# Altium PCB SYNCBOX.PcbDoc (part 1 of 6)
Units mil, origin at the board's own origin, x right, y up, seen from the top; angles counter-clockwise.
Board outline 8392.2 x 6163.59 mil, 6 copper layers (L1, L2, L3, L4 (PWR), L5, L6), stack 60.709 mil thick; 316 components, 422 nets, 1421 pads, 499 vias.
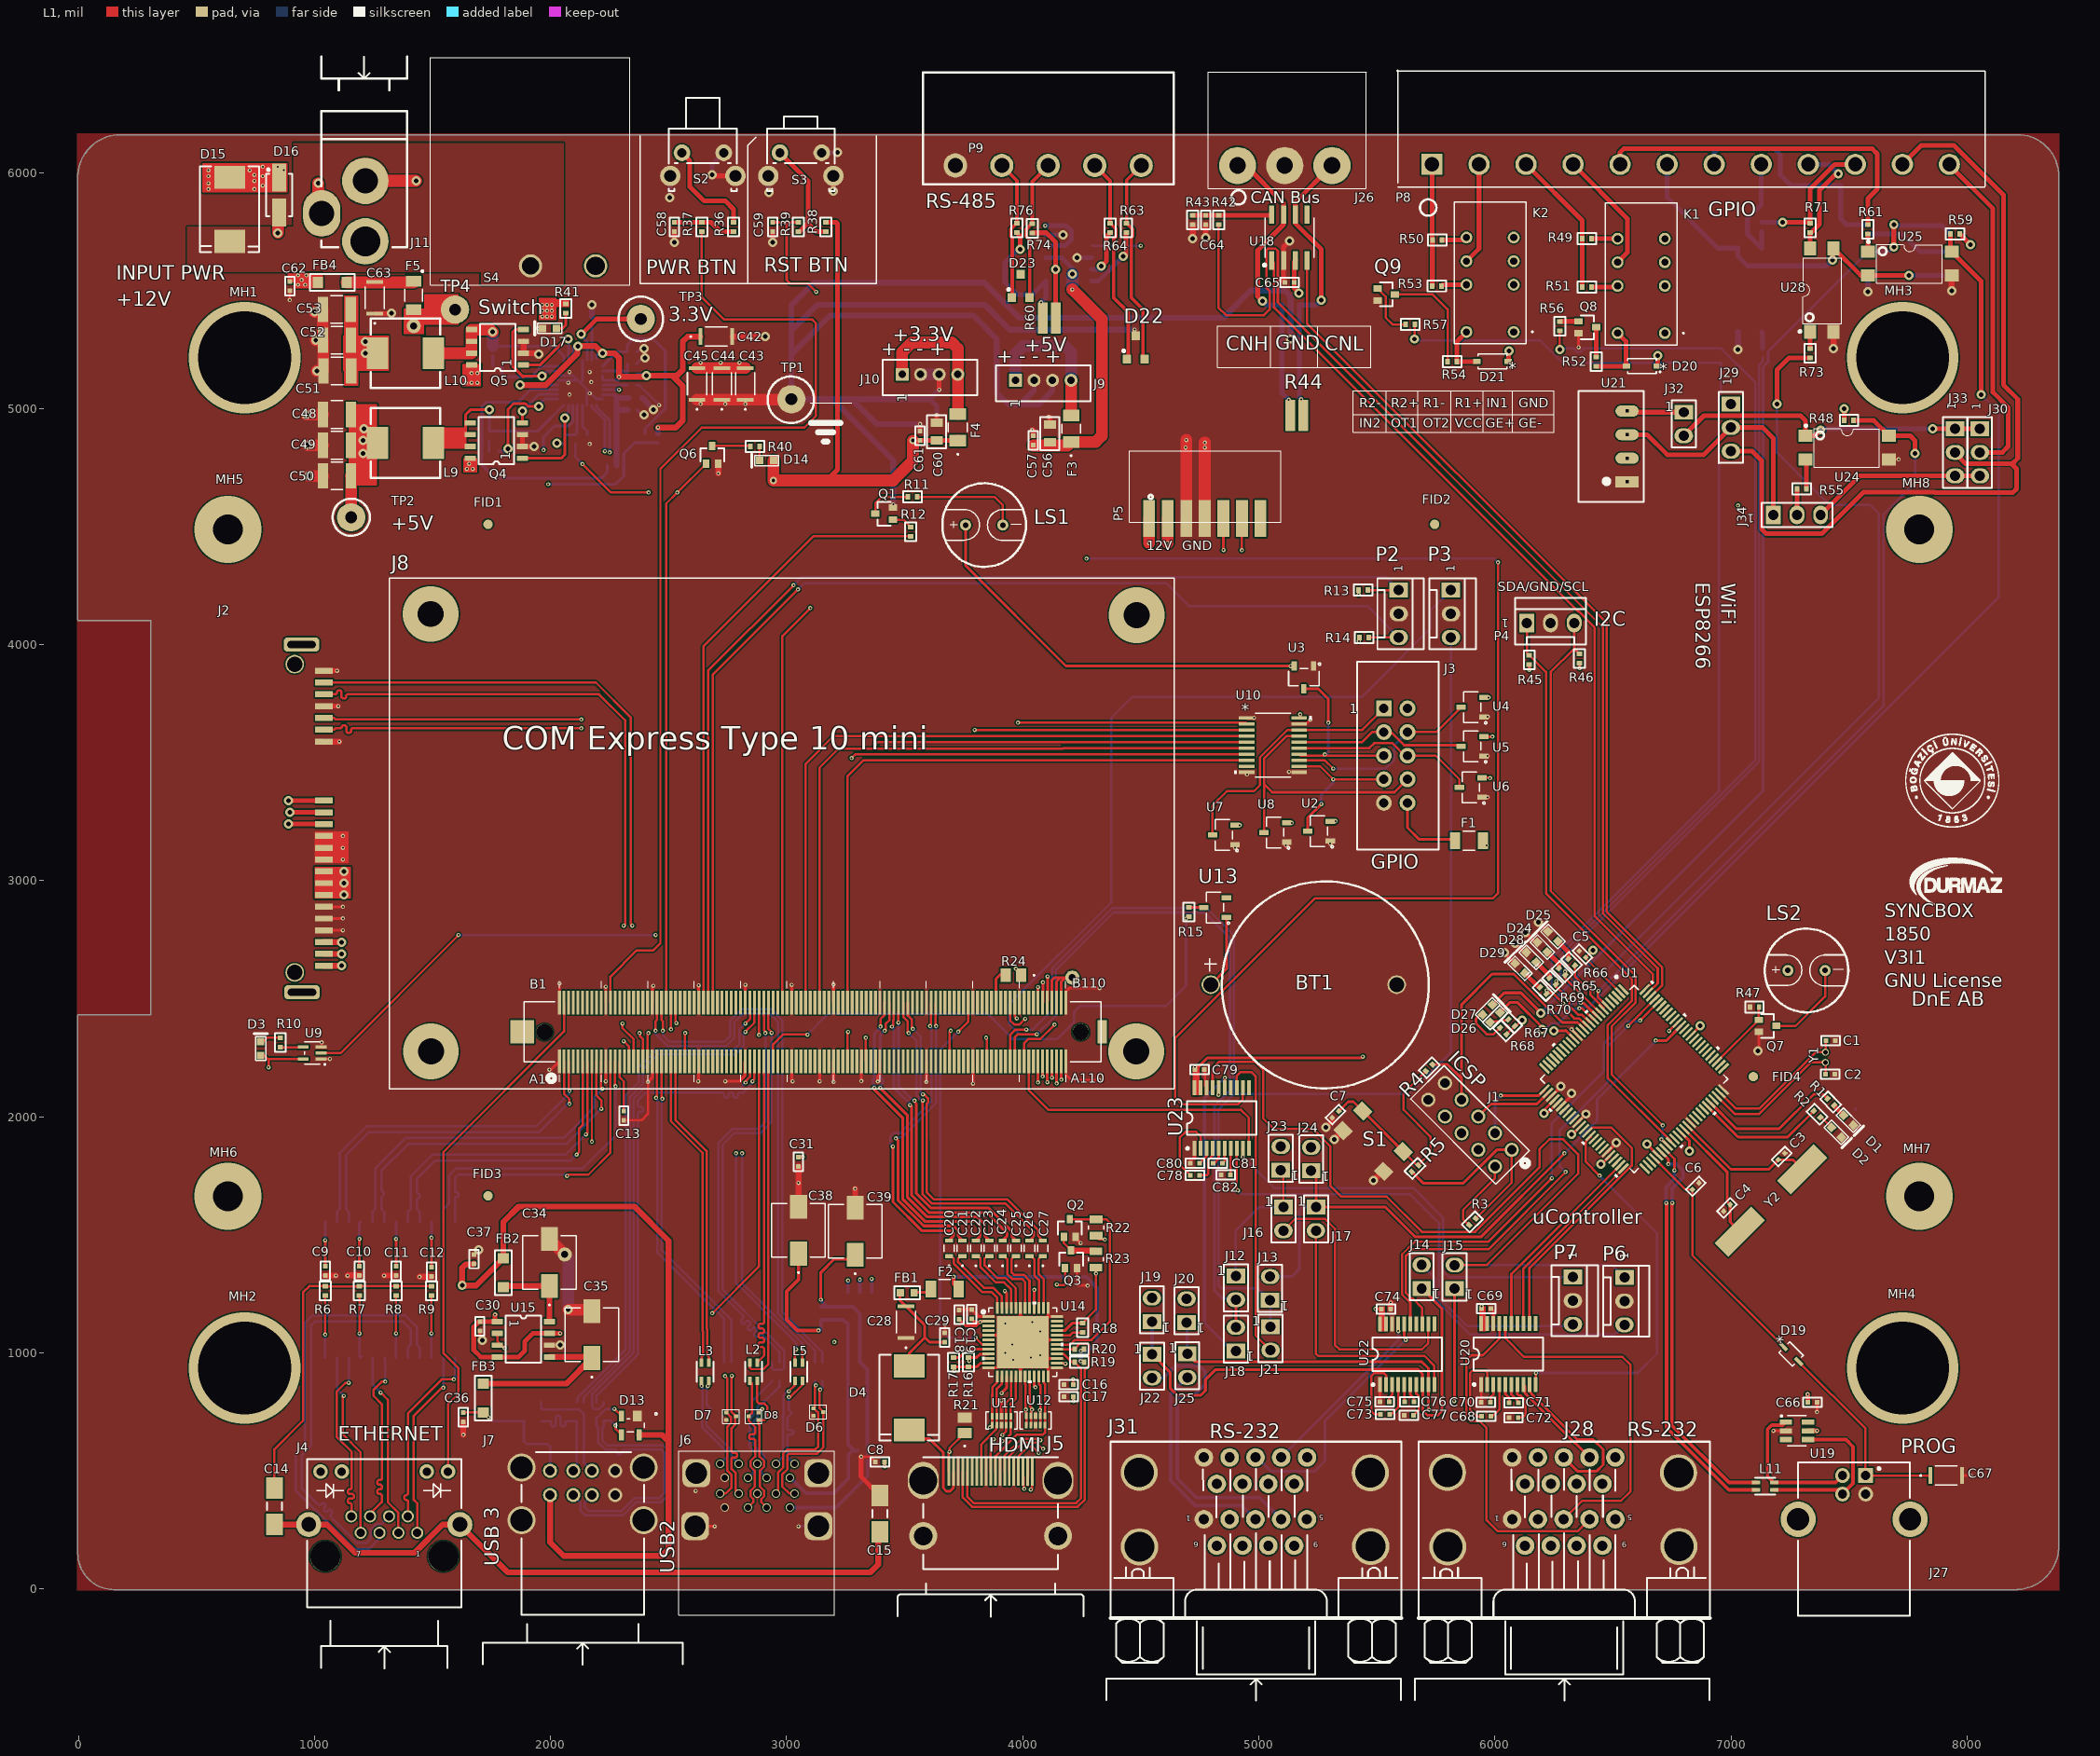
[diagram p0: L1 view]
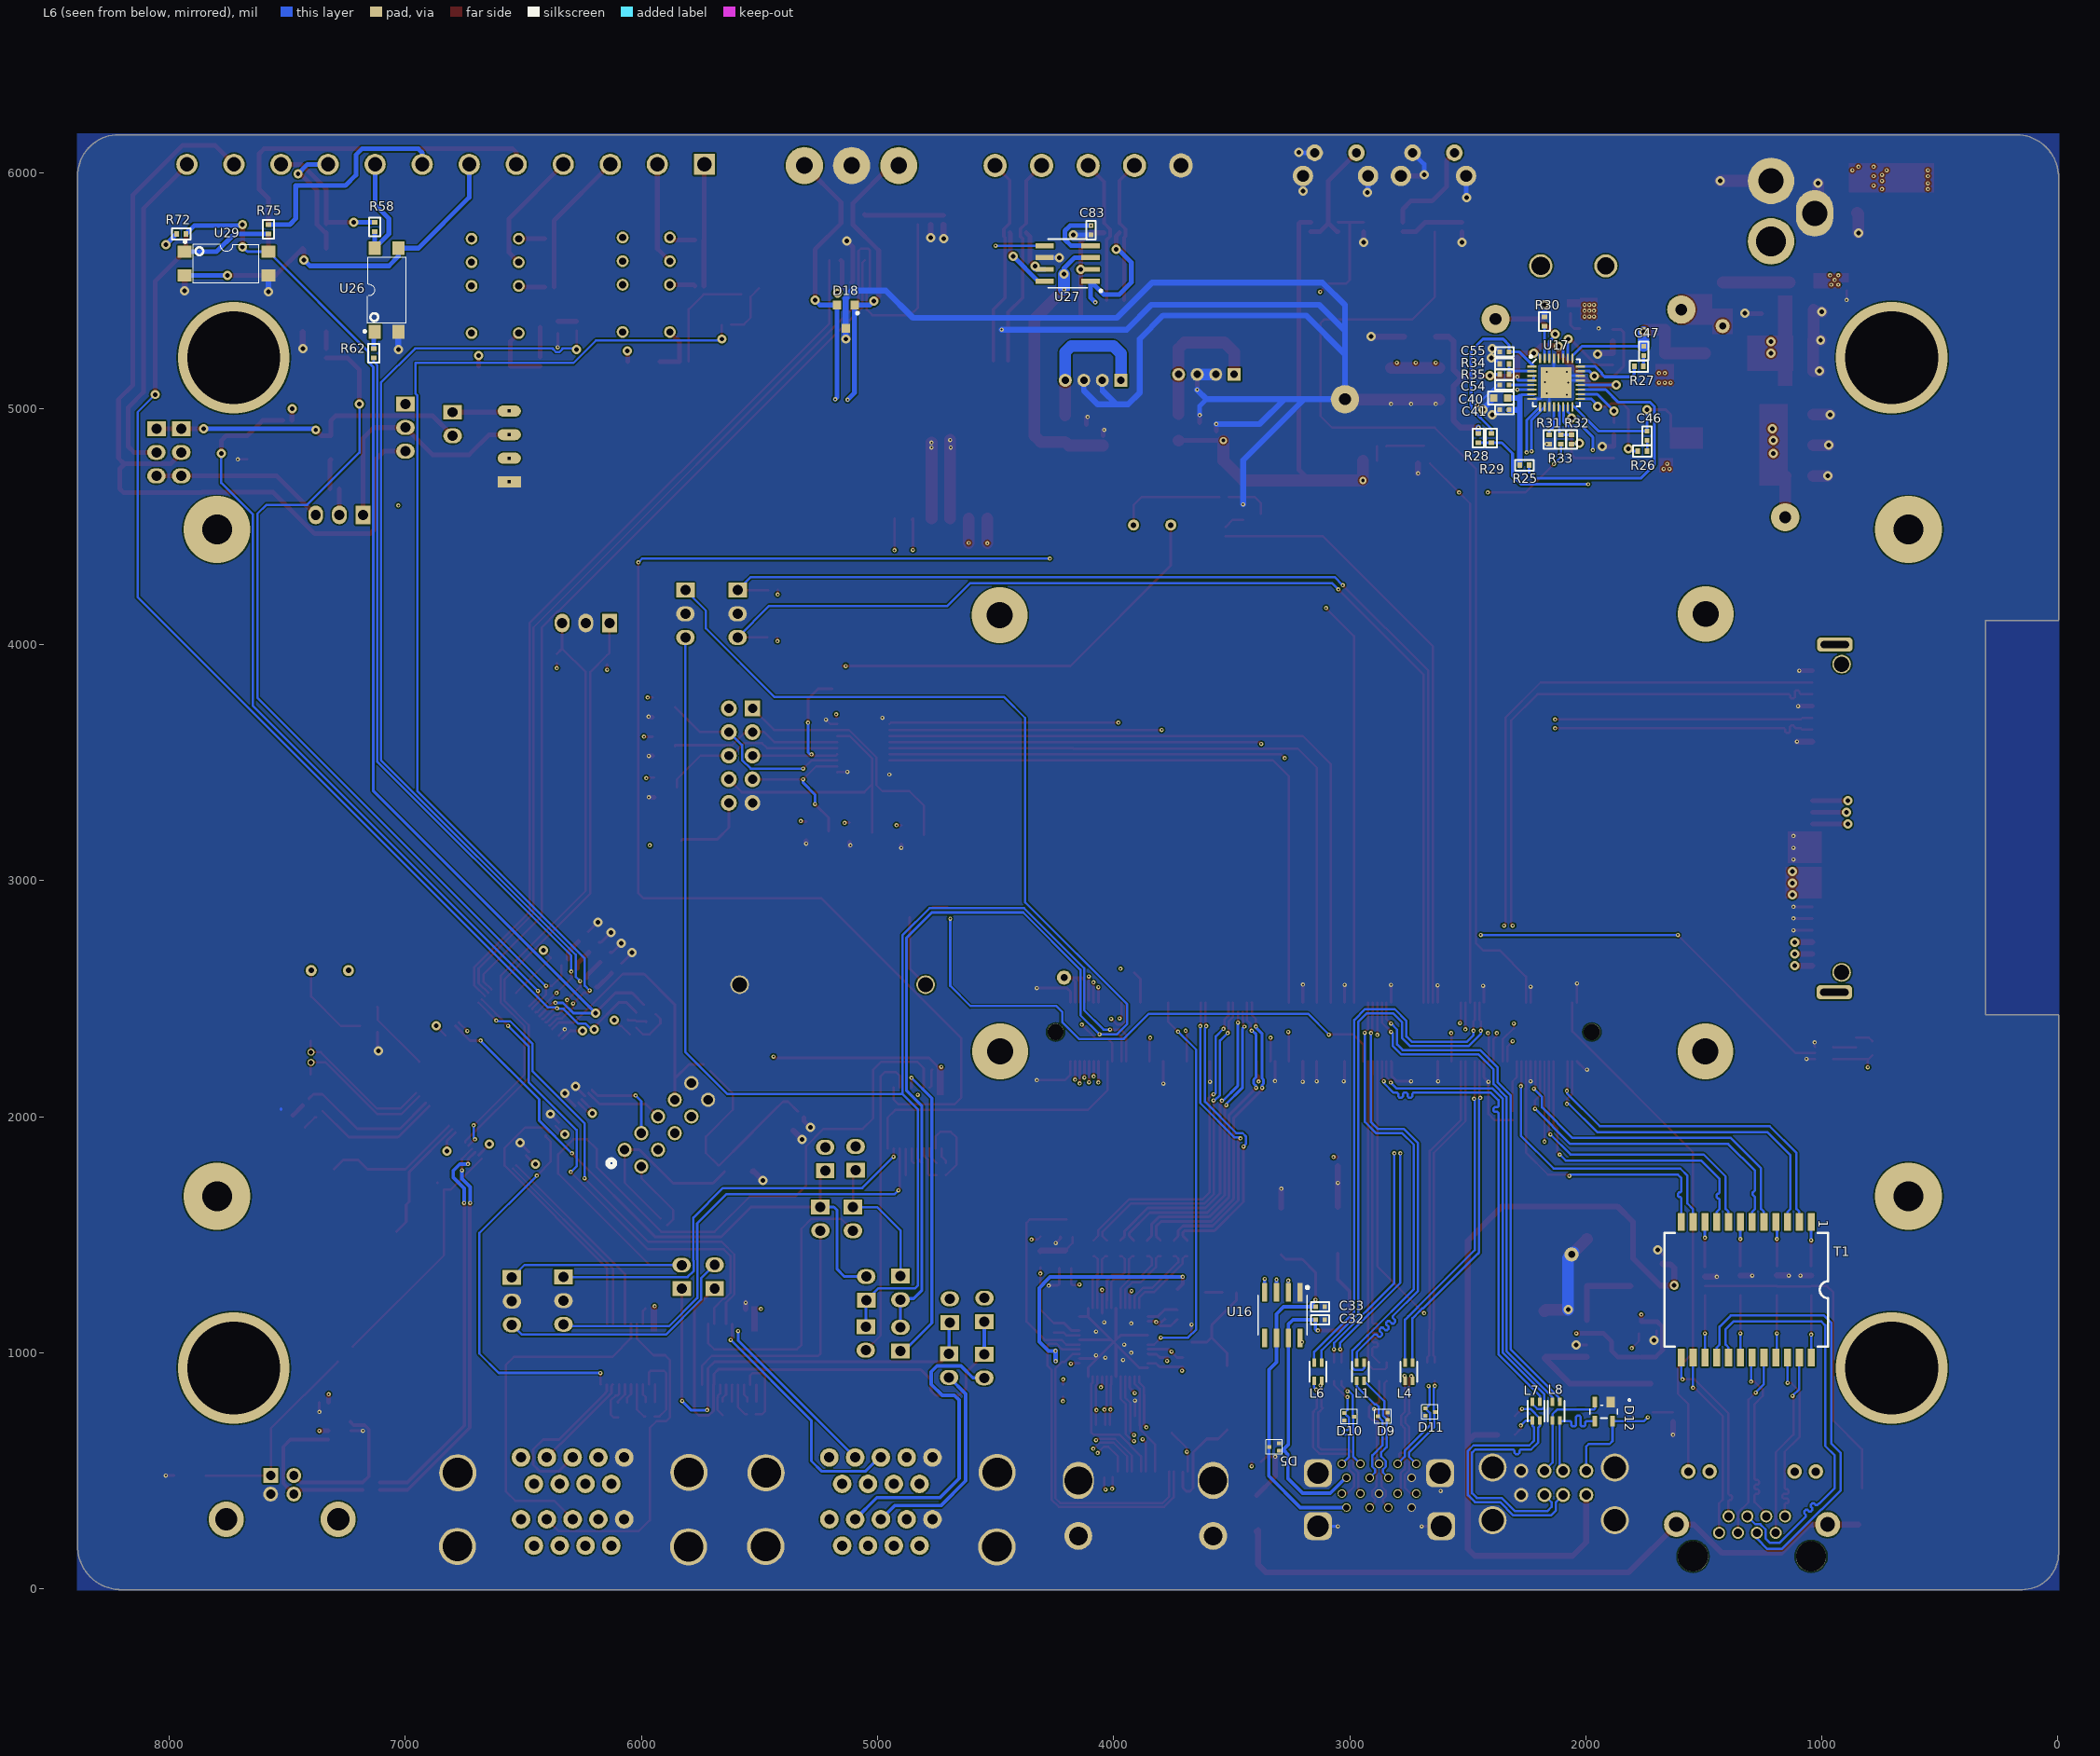
[diagram p1: L6 view, seen from below]
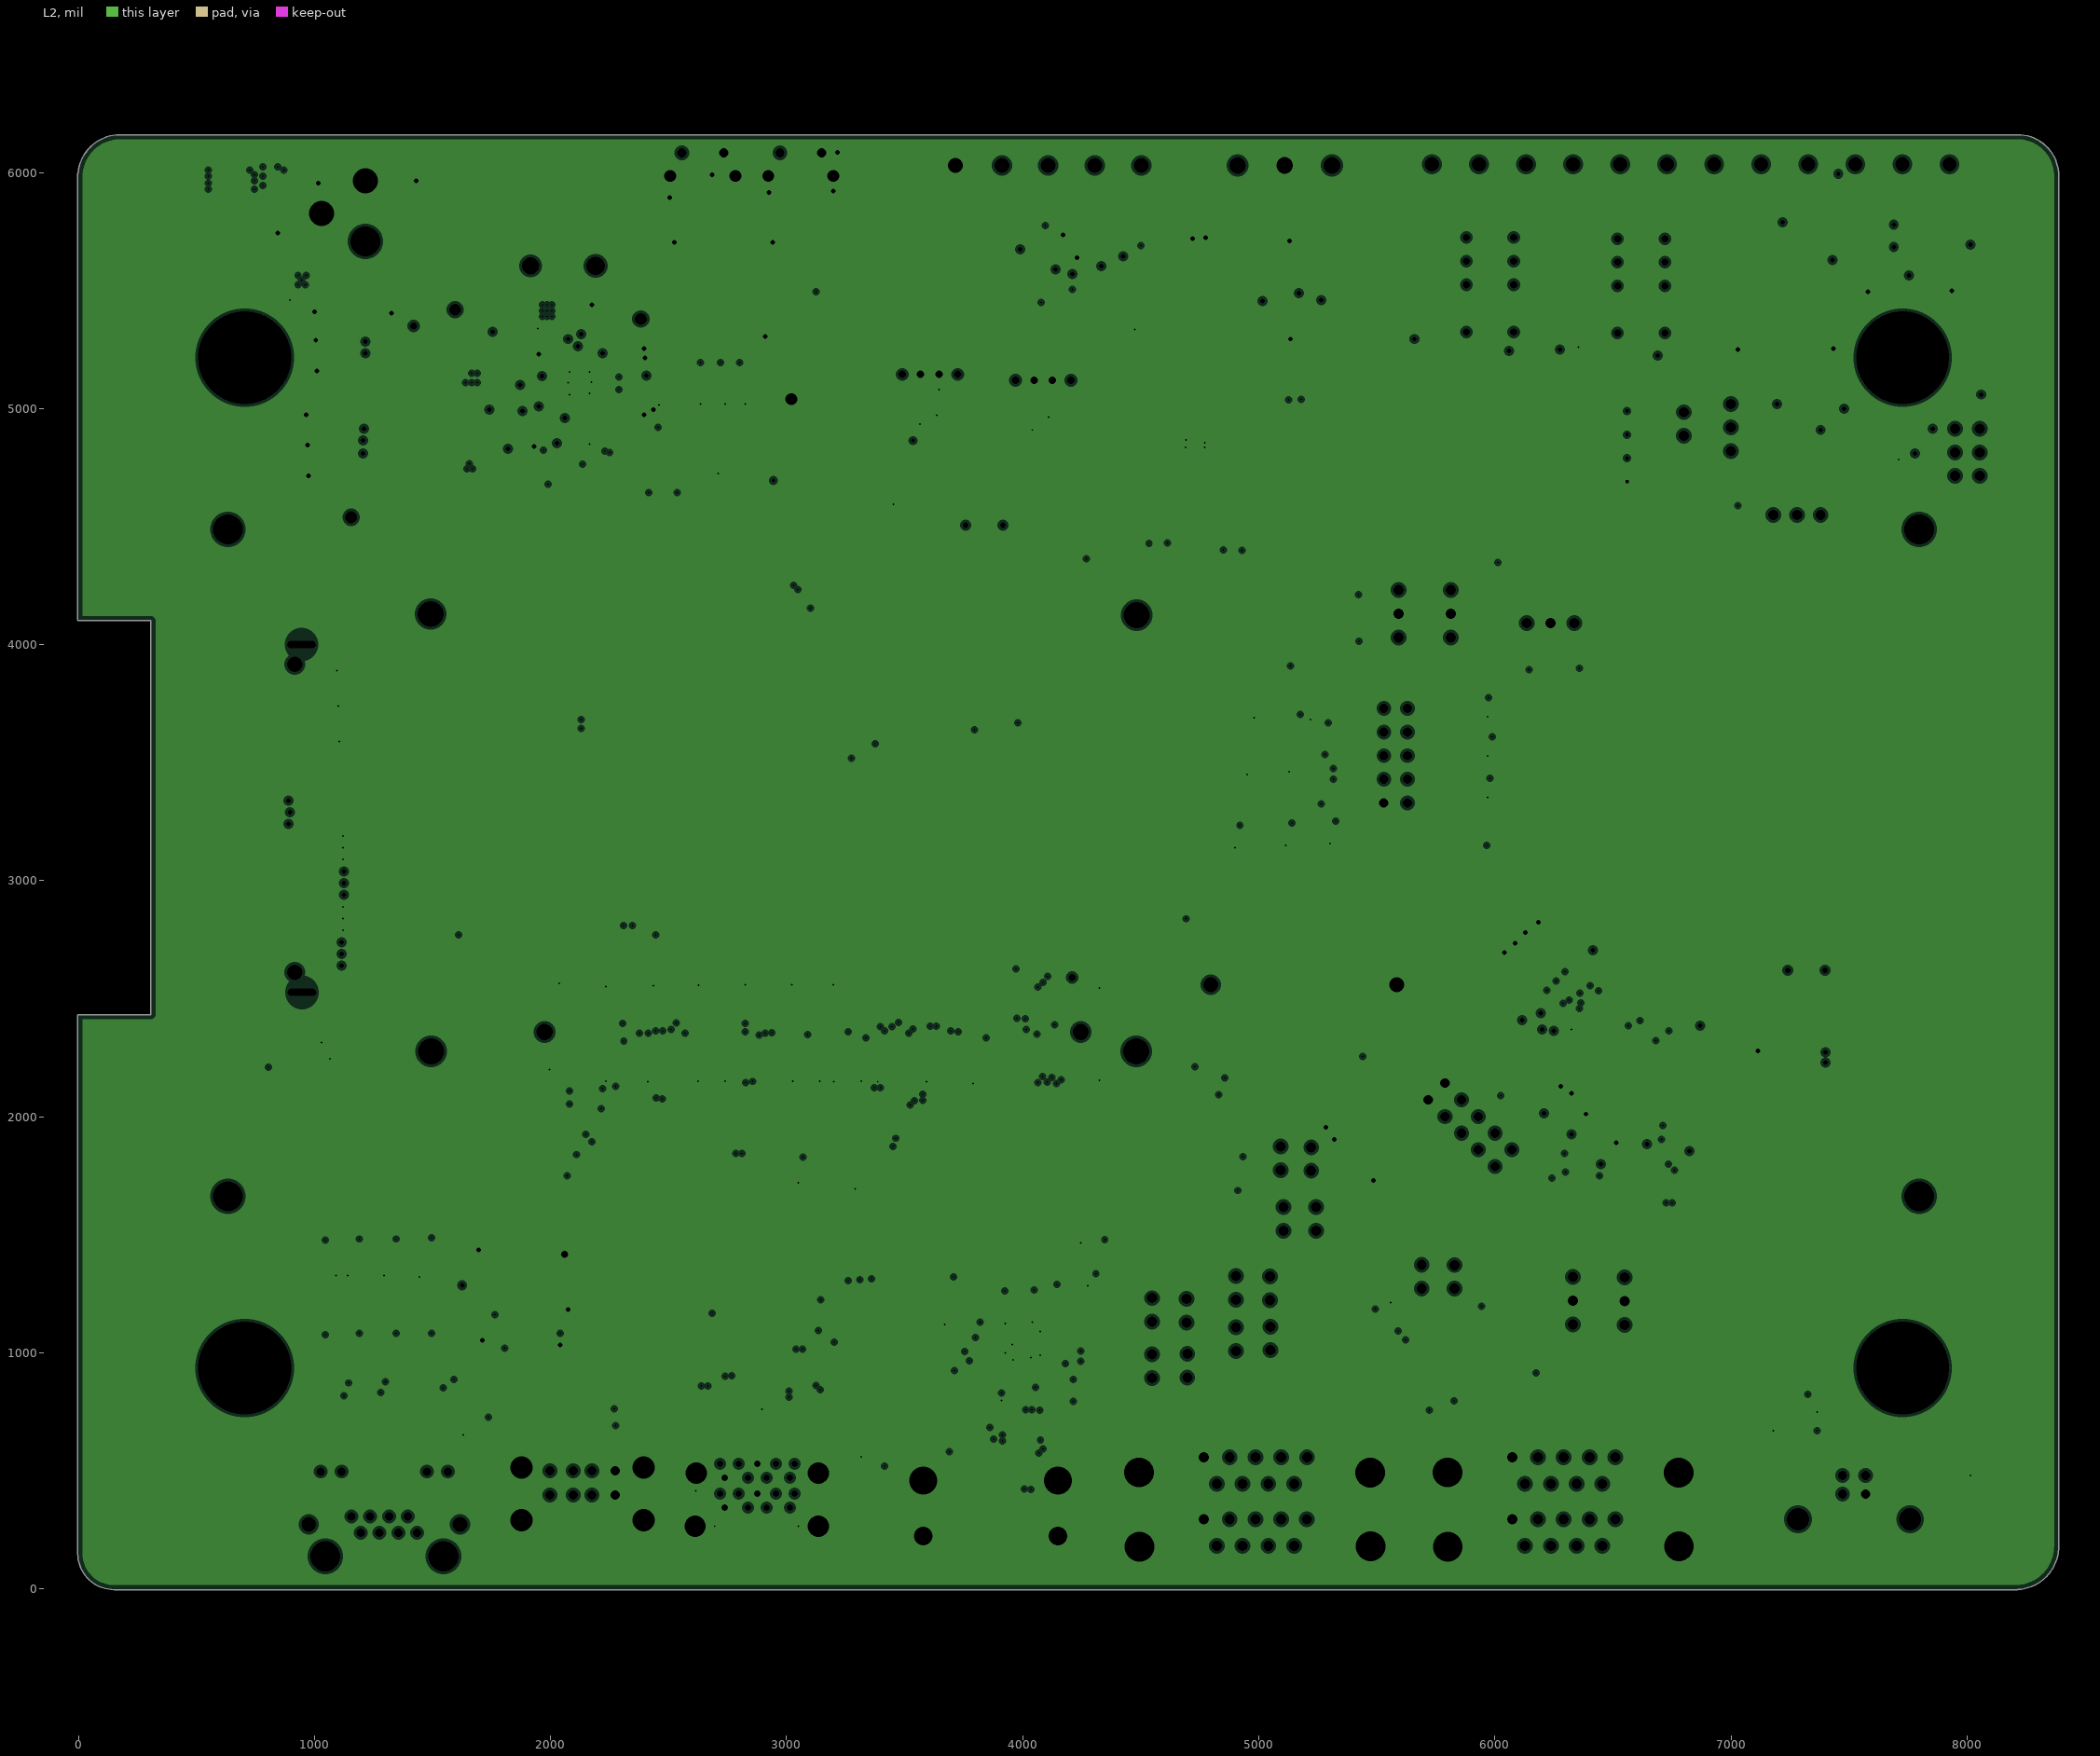
[diagram p2: L2, clearances drawn from the general rule]
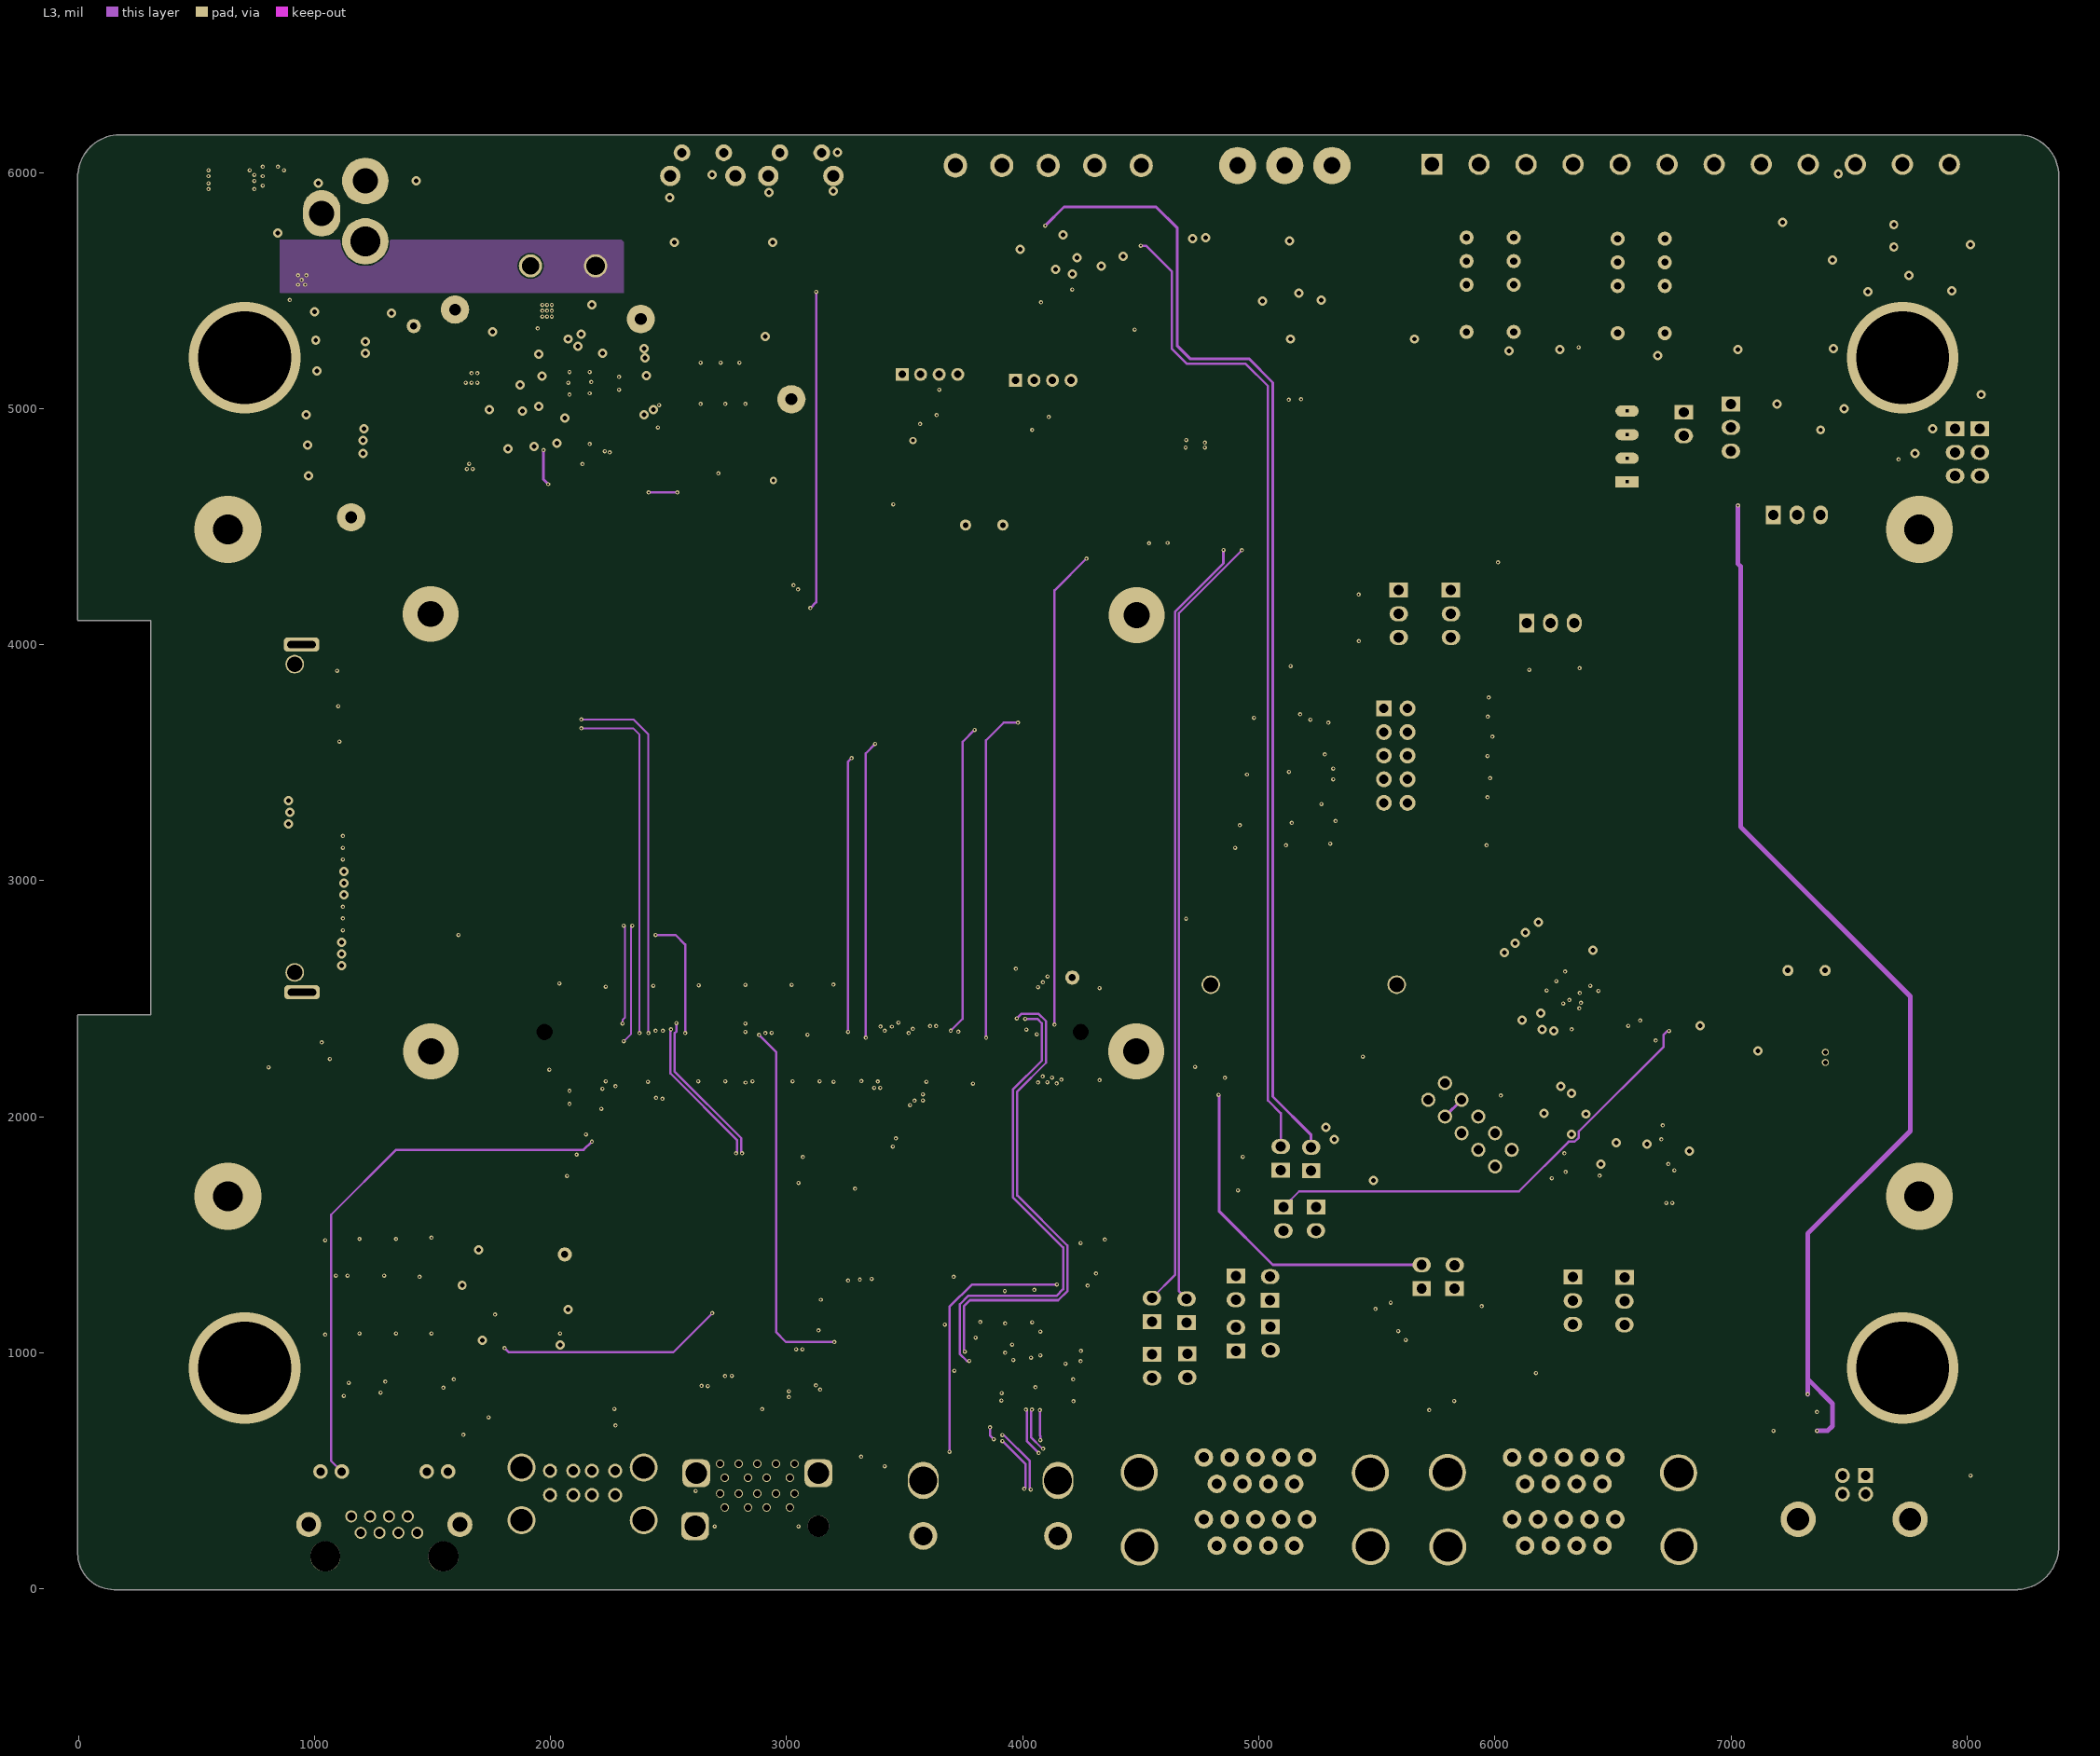
[diagram p3: L3]
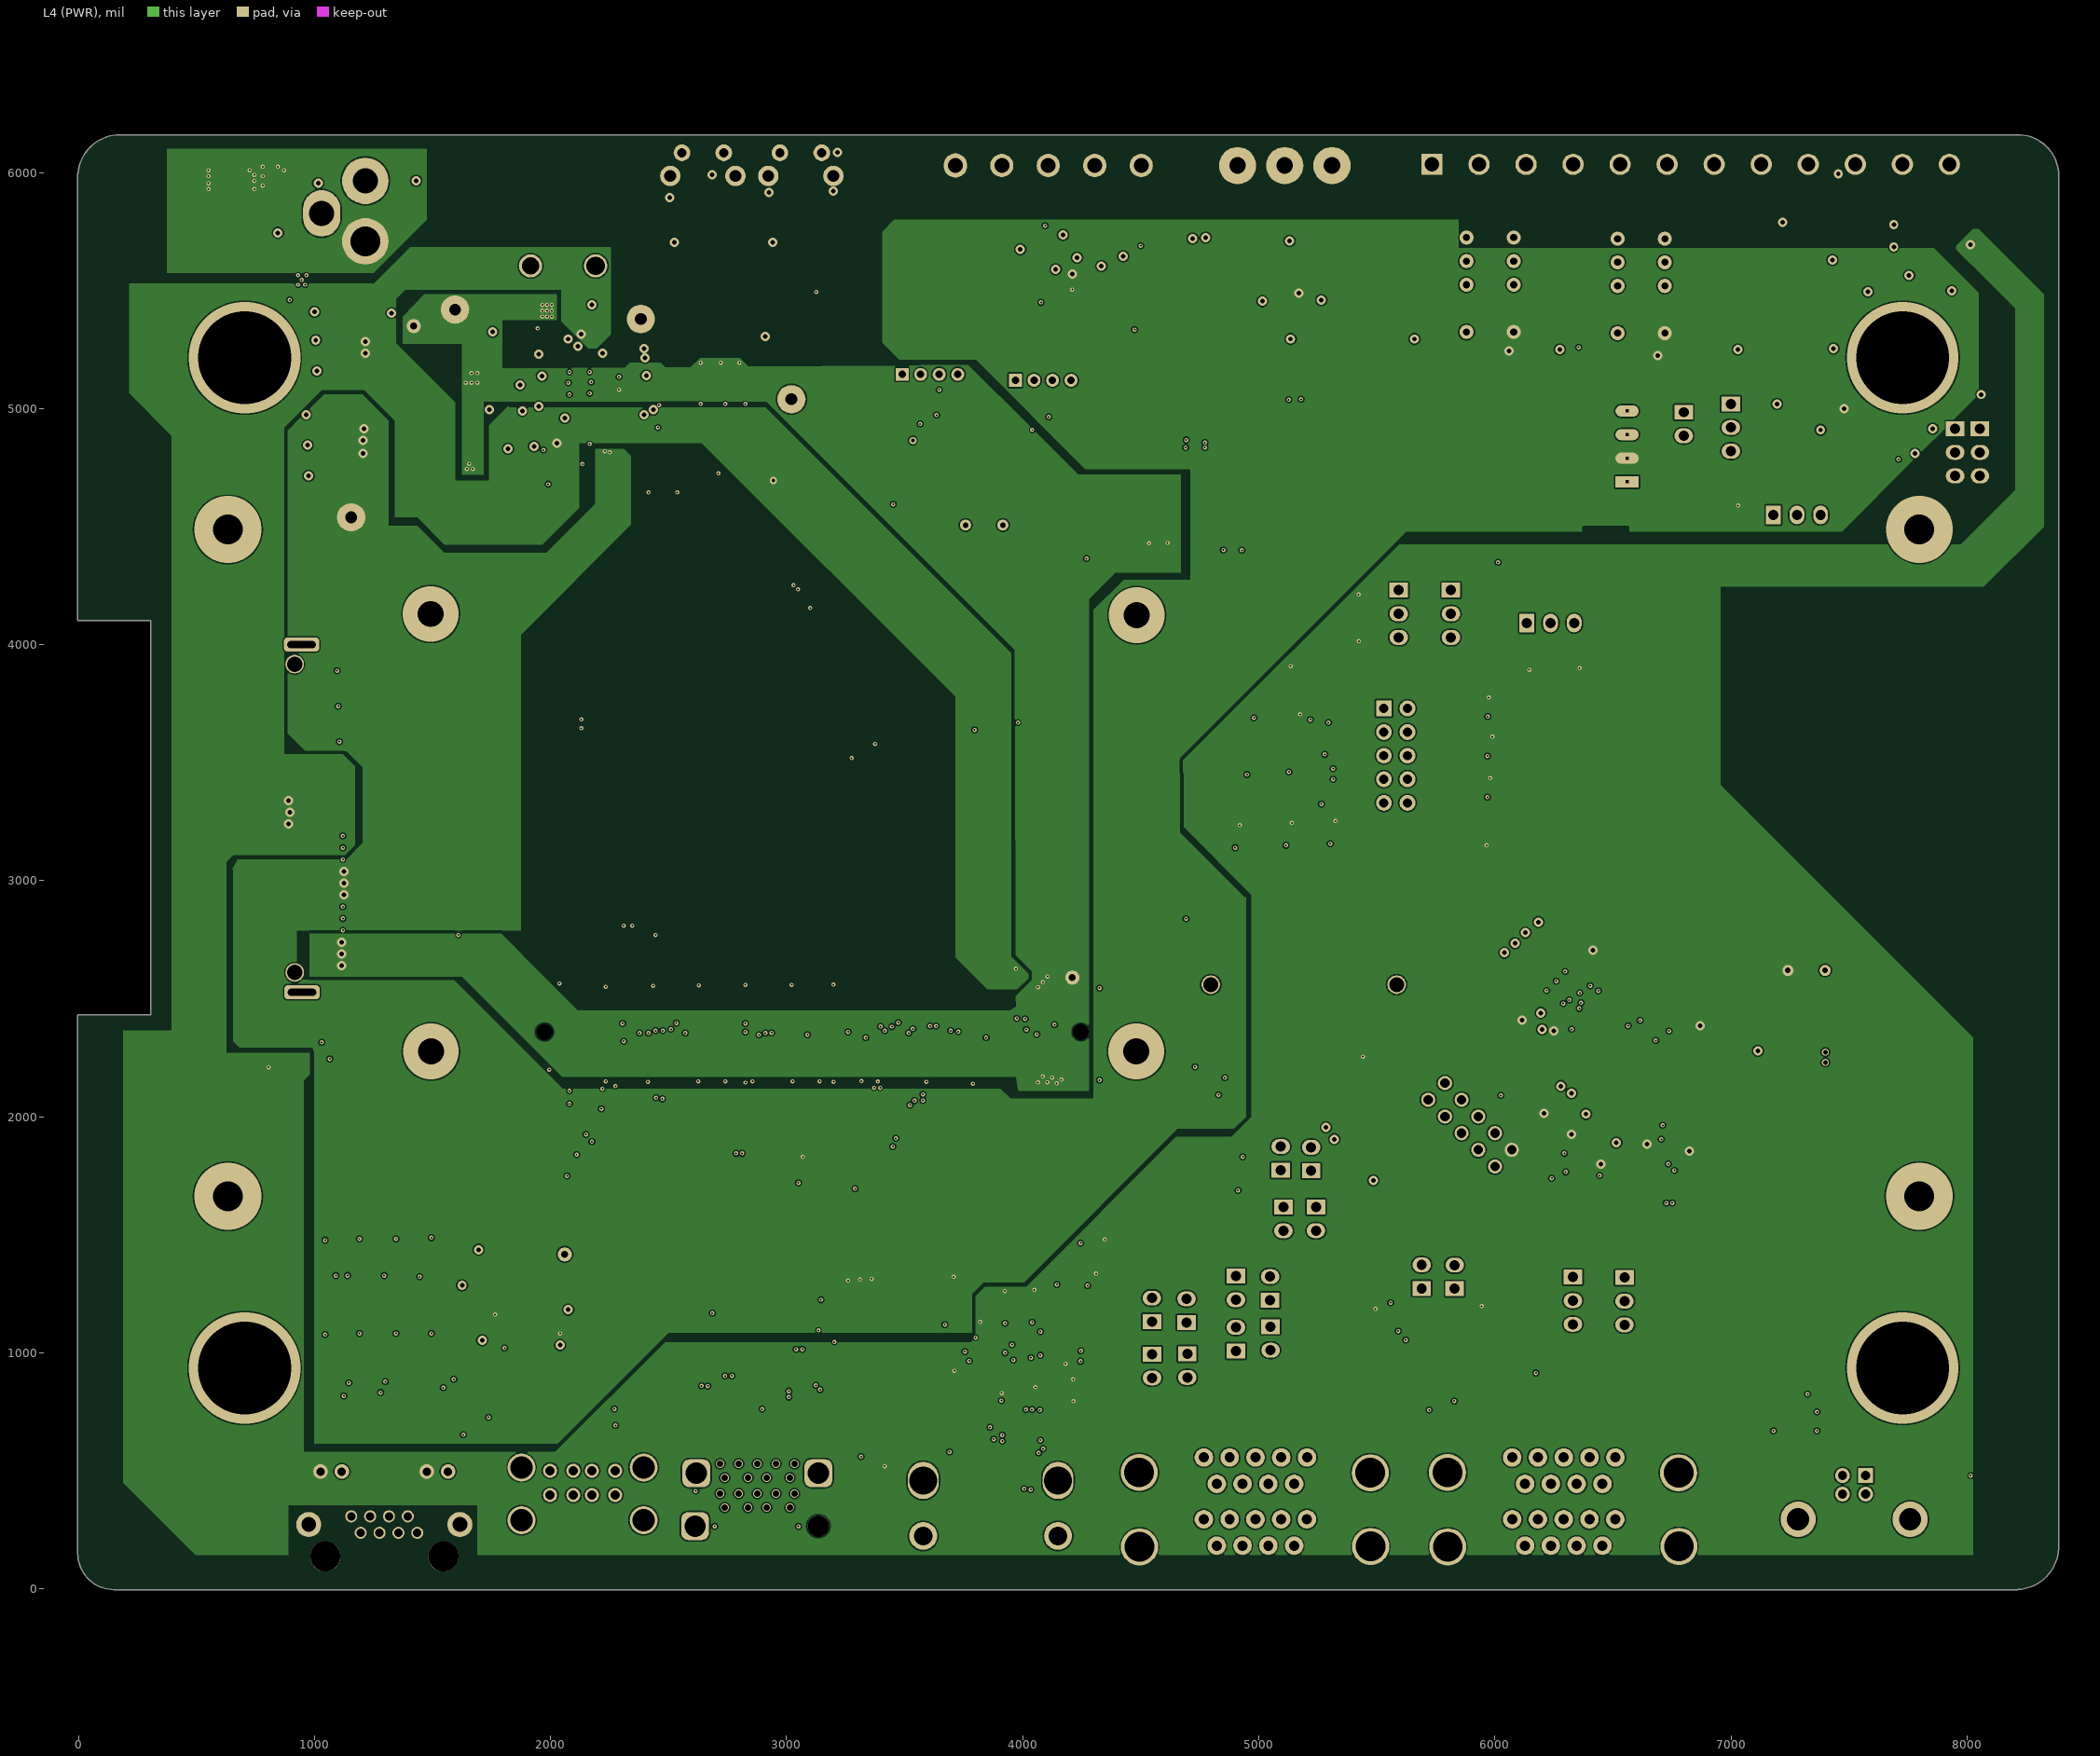
[diagram p4: L4 (PWR)]
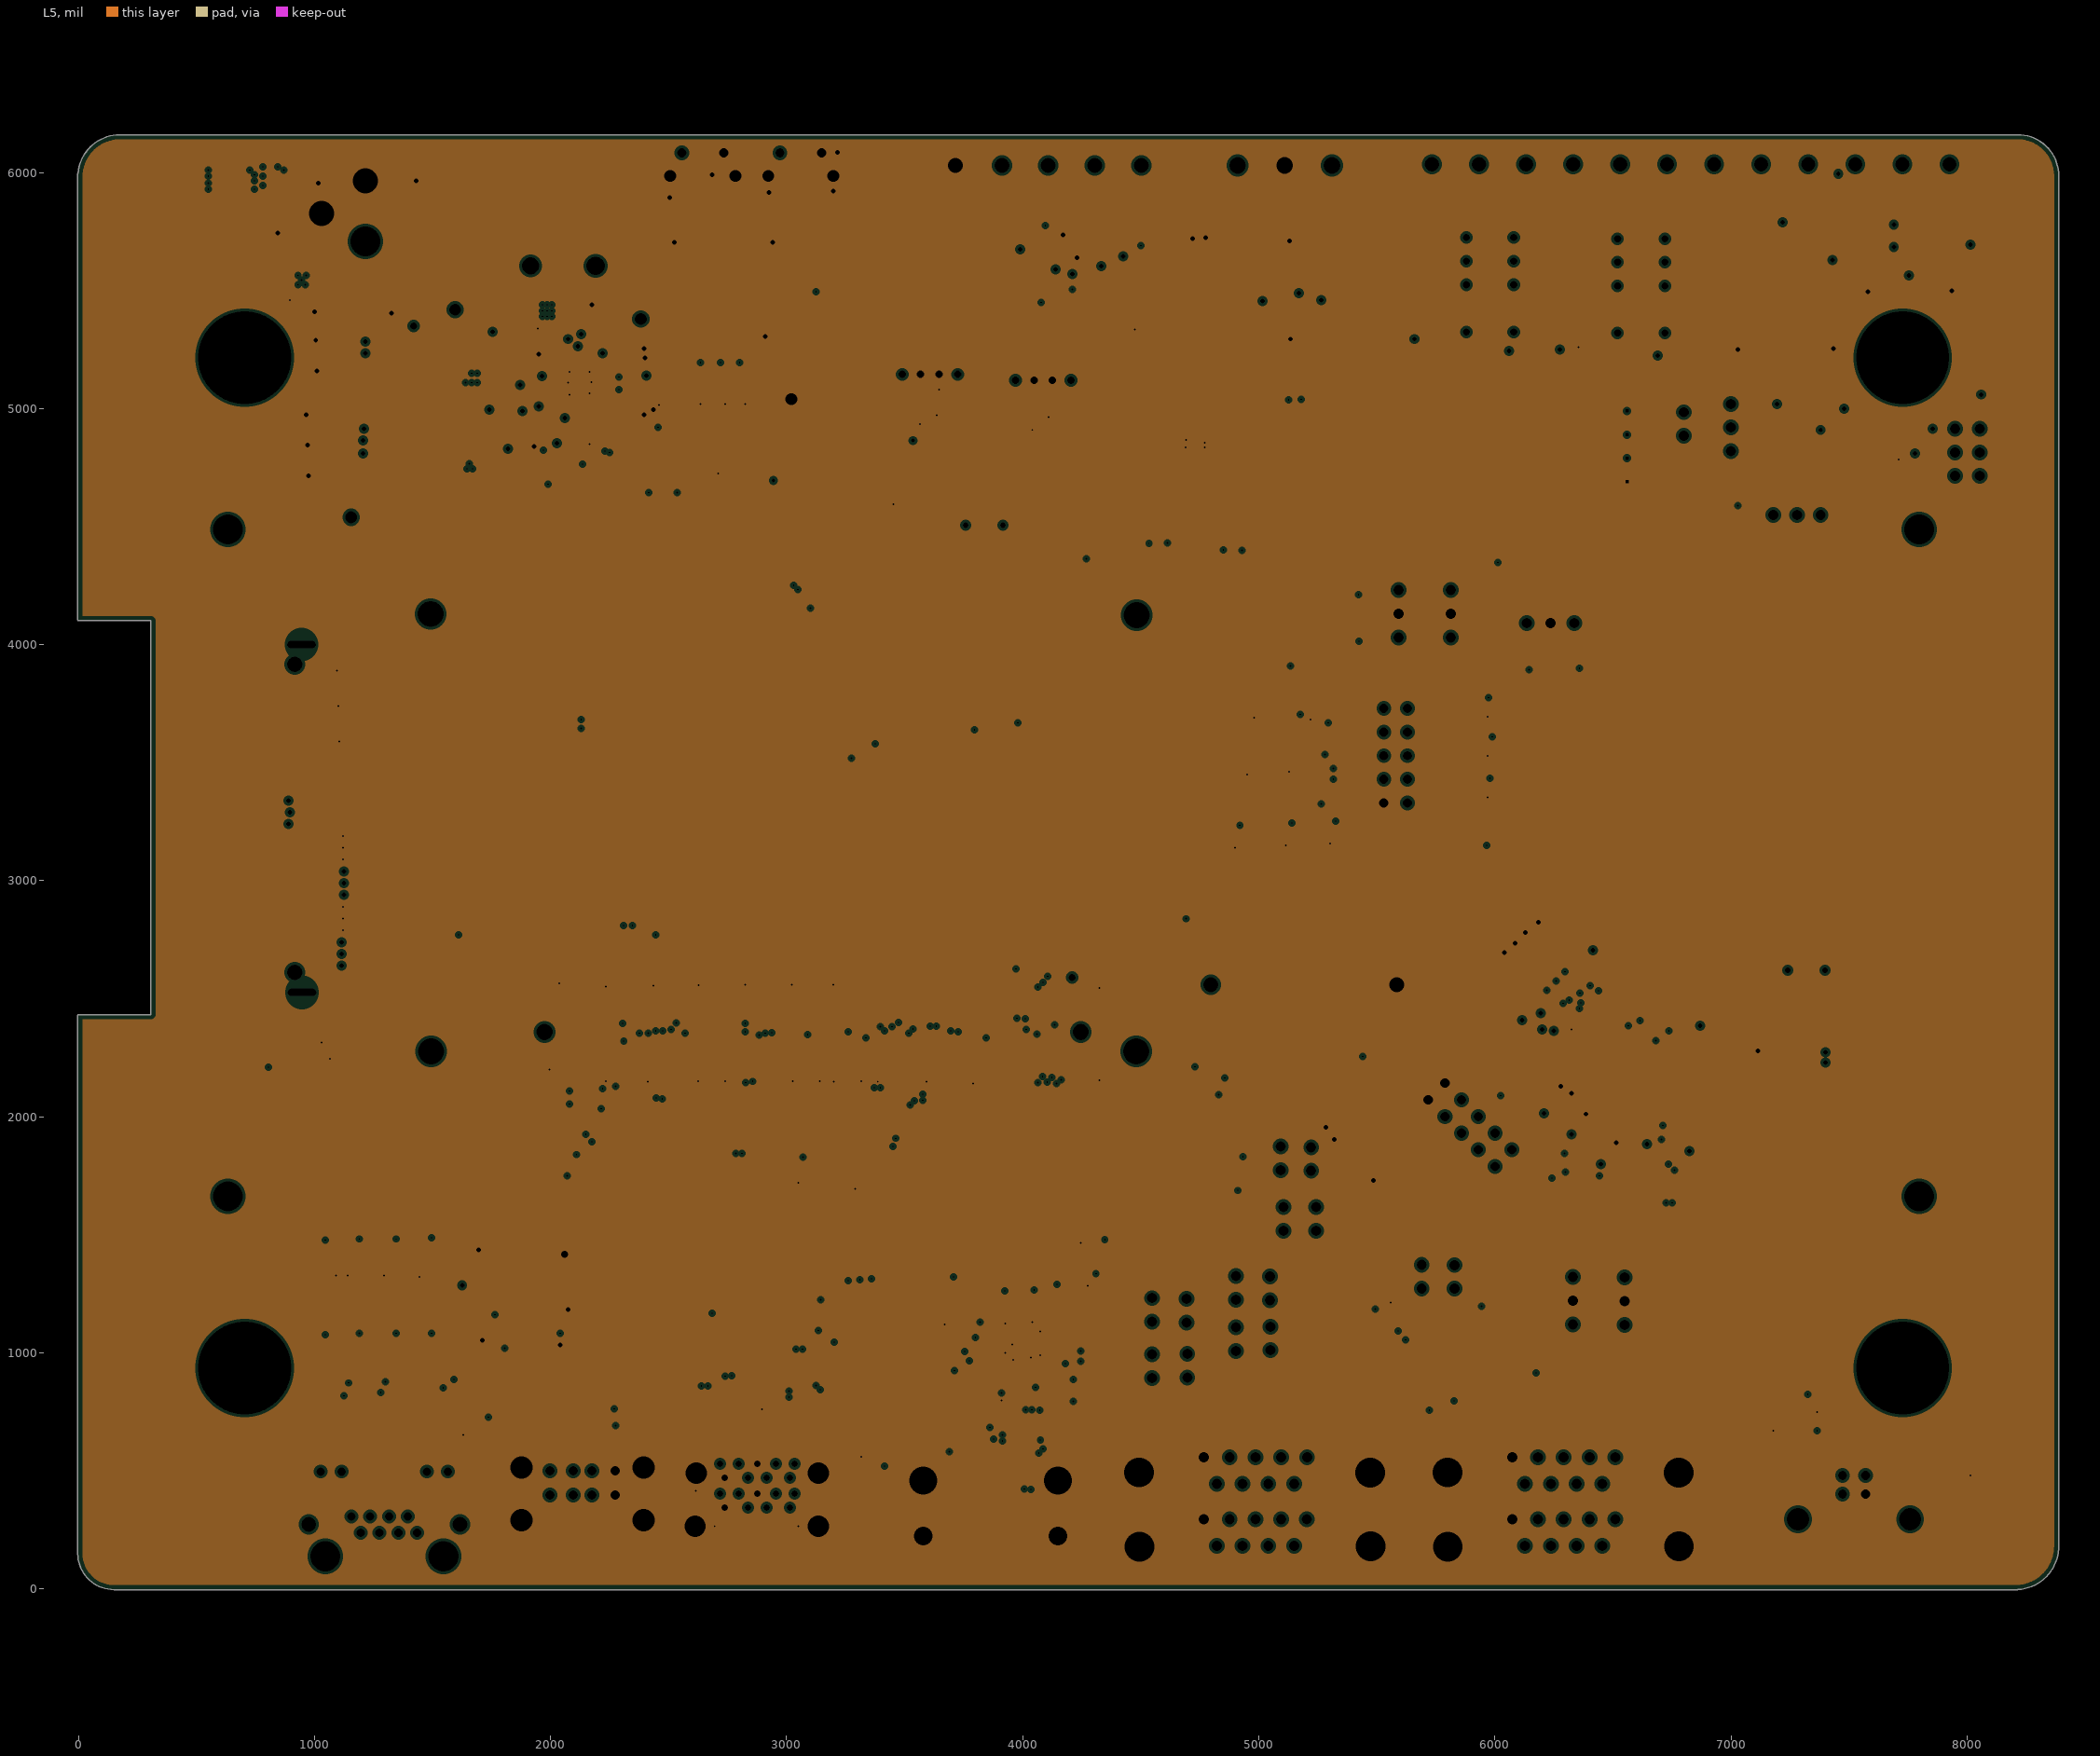
[diagram p5: L5, clearances drawn from the general rule]

## Layer stack, top to bottom
Top Solder: solder mask 0.4, Solder Resist, Dk 3.5
L1: signal copper 0.709
Dielectric1: core 6.791, DE 104 ML, Dk 4.4
L2: plane copper 0.709, net GND
Dielectric4: prepreg 7.716, DE 104 ML, Dk 4.4
L3: signal copper 0.709
Dielectric2: core 27.441, DE 104 ML, Dk 4.4
L4 (PWR): signal copper 0.709
Dielectric3: prepreg 7.716, DE 104 ML, Dk 4.4
L5: plane copper 0.709, net GND
Dielectric5: core 6.791, DE 104 ML, Dk 4.4
L6: signal copper 0.709
Bottom Solder: solder mask 0.4, Solder Resist, Dk 3.5

## Board outline
-3.01,149.89 cw(c0,150) -3.01,150 -3.01,2430 cw(c0,2430) 0,2433.01 306.98,2433.01 306.98,4101.98 0,4101.98 cw(c0,4105) -3.01,4105 -3.01,5979.98 cw(c176.24,5981.24) -3.01,5982.5 -3.01,5995 cw(c0,5995) -2.33,5996.91 cw(c176.24,5981.24) 160.57,6159.81 cw(c162.48,6157.48) 162.48,6160.5 8227.52,6160.5 cw(c8227.52,6157.48) 8228.76,6160.23 cw(c8214.17,5985.83) 8388.57,6000.42 cw(c8385.83,5999.17) 8388.84,5999.17 8388.84,5996.75 cw(c8214.17,5985.83) 8389.18,5985.83 cw(c8214.17,5985.83) 8388.84,5974.91 8388.84,170.83 cw(c8385.83,170.83) 8388.61,169.66 cw(c8205.41,180.41) 8216.16,-2.78 cw(c8215,0) 8215,-3.01 8210.87,-3.01 cw(c8205.41,180.41) 8199.95,-3.01 cw(c8205.41,180.41) 8199.91,-3.01 8199.95,-3.01 149.77,-3.01 cw(c149.77,149.77) -3.01,149.77 cw(c0,149.77)

## Design rules (kind name [scope] priority, off if disabled: settings)
Clearance "Poly PWR to Via" [IsRegion AND OnLayer('L4 (PWR)') vs IsVia] p1: gap=5.91 ignorepadtopadclearanceinfootprint=FALSE except(0: Arc-Hole Track-Hole SMDPad-Hole THPad-Hole Via-Hole Fill-Hole Poly-Hole Region-Hole Text-Hole)
Clearance "Poly to Poly" [IsRegion AND OnLayer('L4 (PWR)') vs IsRegion] p2: gap=15.75 ignorepadtopadclearanceinfootprint=FALSE except(0: Arc-Hole Track-Hole SMDPad-Hole THPad-Hole Via-Hole Fill-Hole Poly-Hole Region-Hole Text-Hole)
Clearance [All] p3: gap=5.91 ignorepadtopadclearanceinfootprint=FALSE except(0: Arc-Hole Track-Hole SMDPad-Hole THPad-Hole Via-Hole Fill-Hole Poly-Hole Region-Hole Text-Hole)
ComponentClearance [All] p1: gap=-200 collisioncheckmode=3 verticalgap=0 showdistances=TRUE
DiffPairsRouting DiffPair_DIFF100DiffPairsRouting [InDifferentialPairClass('DIFF100')] p1: maxlimit=19.72 minlimit=15.71 mostfreqgap=19.68 toplayer_maxgap=15.79 toplayer_prefgap=15.75 toplayer_minwidth=9.84 toplayer_maxwidth=9.84 toplayer_prefwidth=9.84 midlayer1_mingap=19.65 midlayer1_minwidth=7.87 midlayer1_maxwidth=7.87 midlayer1_prefwidth=7.87 midlayer2_mingap=15.75 midlayer2_maxgap=15.75 midlayer2_prefgap=15.75 midlayer2_minwidth=9.84 midlayer2_maxwidth=9.84 midlayer2_prefwidth=9.84 bottomlayer_maxgap=15.79 bottomlayer_prefgap=15.75 bottomlayer_minwidth=9.84 bottomlayer_maxwidth=9.84 bottomlayer_prefwidth=9.84 maxuncoupledlength=736.22
DiffPairsRouting DiffPair_DIFF90DiffPairsRouting [InDifferentialPairClass('DIFF90')] p2: maxlimit=9.88 minlimit=7.83 mostfreqgap=9.84 toplayer_maxgap=7.91 toplayer_prefgap=7.87 toplayer_minwidth=9.84 toplayer_maxwidth=9.84 toplayer_prefwidth=9.84 midlayer1_mingap=9.8 midlayer1_minwidth=7.87 midlayer1_maxwidth=7.87 midlayer1_prefwidth=7.87 midlayer2_mingap=7.87 midlayer2_maxgap=7.87 midlayer2_prefgap=7.87 midlayer2_minwidth=9.84 midlayer2_maxwidth=9.84 midlayer2_prefwidth=9.84 bottomlayer_maxgap=7.91 bottomlayer_prefgap=7.87 bottomlayer_minwidth=9.84 bottomlayer_maxwidth=9.84 bottomlayer_prefwidth=9.84 maxuncoupledlength=318.9
DiffPairsRouting [All] p3: maxlimit=7.87 minlimit=7.87 mostfreqgap=7.87 toplayer_minwidth=10 toplayer_maxwidth=15 toplayer_prefwidth=15 midlayer1_minwidth=10 midlayer1_maxwidth=15 midlayer1_prefwidth=15 midlayer2_minwidth=10 midlayer2_maxwidth=15 midlayer2_prefwidth=15 bottomlayer_minwidth=10 bottomlayer_maxwidth=15 bottomlayer_prefwidth=15 maxuncoupledlength=500
Height [All] p1: minheight=0 maxheight=1574.8 prefheight=500
HoleSize [All] p1: absolutevalues=TRUE maxlimit=393.7 minlimit=7.87 maxpercent=80.000 minpercent=20.000
MatchedLengths DiffPair_DIFF100MatchedLengths [InDifferentialPairClass('DIFF100')] p1: tolerance=5 checknetsindiffpair=TRUE checkdiffpairvsdiffpair=FALSE checkxsignals=FALSE checkothers=FALSE
MatchedLengths DiffPair_DIFF90MatchedLengths [InDifferentialPairClass('DIFF90')] p2: tolerance=5 checknetsindiffpair=TRUE checkdiffpairvsdiffpair=FALSE checkxsignals=FALSE checkothers=FALSE
MinimumSolderMaskSliver [All] p1: minsoldermaskwidth=0
PlaneClearance [All] p1: clearance=11.81
PlaneConnect "GND to PAD" [(InNet('GND') and IsPad)] p1: planeconnectstyle=Relief reliefexpansion=11.81 reliefentries=4 reliefconductorwidth=19.68 reliefairgap=7.87
PlaneConnect [All] p2: planeconnectstyle=Direct reliefexpansion=7.87 reliefentries=4 reliefconductorwidth=11.81 reliefairgap=7.87
PolygonConnect [All] p1: connectstyle=Direct reliefconductorwidth=10 reliefentries=4 polygonreliefangle="90 Angle" airgapwidth=10
RoutingVias [All] p1: holewidth=7.87 width=17.72 viastyle="Through Hole" minholewidth=7.87 minwidth=17.72 maxholewidth=19.68 maxwidth=275.59
SilkToSilkClearance [All] p1: silktosilkclearance=0
SilkToSolderMaskClearance SilkscreenOverComponentPads [IsPad] p1: minsilkscreentomaskgap=0 clearancetoexposedcopper=TRUE
SolderMaskExpansion [All] p1: expansion=4
Width DiffPair_DIFF100Width [InDifferentialPairClass('DIFF100')] p1: maxlimit=9.84 minlimit=7.87 preferedwidth=9.84 toplayer_minwidth=9.84 midlayer1_maxwidth=7.87 midlayer1_prefwidth=7.87 midlayer2_minwidth=9.84 bottomlayer_minwidth=9.84 minimp=50.000000 maximp=50.000000 favimp=50.000000
Width DiffPair_DIFF90Width [InDifferentialPairClass('DIFF90')] p2: maxlimit=9.84 minlimit=7.87 preferedwidth=9.84 toplayer_minwidth=9.84 midlayer1_maxwidth=7.87 midlayer1_prefwidth=7.87 midlayer2_minwidth=9.84 bottomlayer_minwidth=9.84 minimp=50.000000 maximp=50.000000 favimp=50.000000
Width "Width Power" [InNet('+VIN') OR InNet('+5V') OR InNet('+3V3') OR InNet('+1V5') OR InNet('+12V_ATX')] p3: maxlimit=157.48 minlimit=7.87 preferedwidth=15.75
Width "Width Ground" [InNet('GND')] p4: maxlimit=1574.8 minlimit=7.87 preferedwidth=15.75
Width [All] p5: maxlimit=78.74 minlimit=7.87 preferedwidth=9.84
21 further rules are at their usual default settings.

## Classes and differential pairs
differential pair class DIFF100: HDMI_D0_TRC HDMI_D1_TRC HDMI_D2_TRC HDMI_D3_TRC MX0 MX1 MX2 MX3 SATA_CON_RX SATA_CON_TX TRD0 TRD1 TRD2 TRD3
net class diff_HDMI: HDMI_P3_N HDMI_P3_P
component class "[03] - MICRO CONTROLLER": C1 C2 C3 C4 C5 C6 C7 D1 D2 J1 R1 R2 R3 R4 R5 S1 U1 Y1 Y2
component class "[04] - COMe CONNECTOR": J8
component class "[05] - POWER": C40 C41 C42 C43 C44 C45 C46 C47 C48 C49 C50 C51 C52 C53 C54 C55 C56 C57 C58 C59 C60 C61 C62 C63 D14 D15 D16 D17 F3 F4 F5 FB4 J9 J10 J11 L9 L10 Q4 Q5 Q6 R25 R26 R27 R28 R29 R30 R31 R32 R33 R34 R35 R36 R37 R38 R39 R40 R41 S2 S3 S4 TP2 TP3 TP4 U17
component class "[06] - MICRO CONTROLLER CONNECTORS": C64 C65 C66 C67 C68 C69 C70 C71 C72 C73 C74 C75 C76 C77 C78 C79 C80 C81 C82 C83 D18 D19 D20 D21 D22 D23 D24 D25 D26 D27 D28 D29 J12 J13 J14 J15 J16 J17 J18 J19 J20 J21 J22 J23 J24 J25 J26 J27 J28 J29 J30 J31 J32 J33 J34 K1 K2 L11 LS2 P3 P4 P5 P6 P7 P8 P9 Q7 Q8 Q9 R42 R43 R44 R45 R46 R47 R48 R49 R50 R51 R52 R53 R54 R55 R56 R57 R58 R59 R60 R61 R62 R63 R64 R65 R66 R67 R68 R69 R70 R71 R72 R73 R74 R75 R76 U18 U19 U20 U21 U22 U23 U24 U25 U26 U27 U28 U29
component class "[07] - CPU CONNECTORS ": BT1 C8 C9 C10 C11 C12 C13 C14 C15 C16 C17 C18 C19 C20 C21 C22 C23 C24 C25 C26 C27 C28 C29 D3 D4 F1 F2 FB1 J2 J3 J4 J5 LS1 P2 Q1 Q2 Q3 R6 R7 R8 R9 R10 R11 R12 R13 R14 R15 R16 R17 R18 R19 R20 R21 R22 R23 R24 T1 U2 U3 U4 U5 U6 U7 U8 U9 U10 U11 U12 U13 U14
component class "[08] - CPU USB": C30 C31 C32 C33 C34 C35 C36 C37 C38 C39 D5 D6 D7 D8 D9 D10 D11 D12 D13 FB2 FB3 J6 J7 L1 L2 L3 L4 L5 L6 L7 L8 U15 U16
component class "[09] - PCB AND MECHANICALS": CBL1 CBL2 FID1 FID2 FID3 FID4 MH1 MH2 MH3 MH4 MH5 MH6 MH7 MH8 MODULE1 PCB1 TP1
net class CANBus: CANH CANL MCU_CAN_INH MCU_CAN_RX MCU_CAN_TX
net class DIFF90: MCU_CON_USB_D_N MCU_CON_USB_D_P SATA_CON_RX_N SATA_CON_RX_P SATA_CON_TX_N SATA_CON_TX_P SSRX0_CON_N SSRX0_CON_P SSRX0_N SSRX0_P SSRX1_CON_N SSRX1_CON_P SSRX1_N SSRX1_P SSTX0_CON_N SSTX0_CON_P SSTX0_N SSTX0_P SSTX1_CON_N SSTX1_CON_P SSTX1_N SSTX1_P USB0_CON_N USB0_CON_P USB0_N USB0_P USB1_CON_N USB1_CON_P USB1_N USB1_P USB2_N USB2_P USB3_N USB3_P USBDN2_CON_N USBDN2_CON_P USBDN3_CON_N USBDN3_CON_P
net class DIFF100: HDMI_AUX_N HDMI_AUX_P HDMI_D0_N HDMI_D0_P HDMI_D1_N HDMI_D1_P HDMI_D2_N HDMI_D2_P HDMI_D3_N HDMI_D3_P HDMI_P0_N HDMI_P0_P HDMI_P1_N HDMI_P1_P HDMI_P2_N HDMI_P2_P HDMI_P3_N HDMI_P3_P MX0_N MX0_P MX1_N MX1_P MX2_N MX2_P MX3_N MX3_P RS485_RES_N RS485_RES_P RS485_SND_N RS485_SND_P TMDS_CLK_N TMDS_CLK_P TMDS_D0_N TMDS_D0_P TMDS_D1_N TMDS_D1_P TMDS_D2_N TMDS_D2_P TRD0_N TRD0_P TRD1_N TRD1_P TRD2_N TRD2_P TRD3_N TRD3_P
net class GPIO: GPIO0 GPIO1 GPIO2 GPIO3 GPIO4 GPIO5 GPIO6
net class HDMI: DDC_CLK DDC_DATA GND HDMI_5V HDMI_AUX_N HDMI_AUX_P HDMI_D0_N HDMI_D0_P HDMI_D1_N HDMI_D1_P HDMI_D2_N HDMI_D2_P HDMI_D3_N HDMI_D3_P HDMI_HPD HDMI_P0_N HDMI_P0_P HDMI_P1_N HDMI_P1_P HDMI_P2_N HDMI_P2_P HDMI_P3_N HDMI_P3_P TMDS_CLK_N TMDS_CLK_P TMDS_D0_N TMDS_D0_P TMDS_D1_N TMDS_D1_P TMDS_D2_N TMDS_D2_P
net class ICSP: /MCLR PGEC PGED
net class MCU_GPIO: GPI1opto GPI2opto GPO1opto GPO2opto R1+ R1- R2+ R2-
net class MCU_USB: MCU_USB_D_N MCU_USB_D_P
net class MX: MX0_N MX0_P MX1_N MX1_P MX2_N MX2_P MX3_N MX3_P
net class PHY: TRD0_N TRD0_P TRD1_N TRD1_P TRD2_N TRD2_P TRD3_N TRD3_P
net class RS232: CON_UART1_RX CON_UART1_TX CON_UART2_RX CON_UART2_TX CON_UART3_RX CON_UART3_TX CON_UART4_RX CON_UART4_TX MCU_TRANS_OUT_RX MCU_TRANS_OUT_TX MCU_TRANS_RX MCU_TRANS_TX MCU_UART1_RX MCU_UART1_TX MCU_UART2_RX MCU_UART2_TX MCU_UART3_RX MCU_UART3_TX MCU_UART4_RX MCU_UART4_TX NetC72_2 NetC77_1
net class SATA: SATA_CON_RX_N SATA_CON_RX_P SATA_CON_TX_N SATA_CON_TX_P
net class USB0: USBDN2_CON_N USBDN2_CON_P USBDN3_CON_N USBDN3_CON_P
differential pair class DIFF90: SSRX0 SSRX0_CON SSRX1 SSRX1_CON SSTX0 USB0 USB0_CON USB1 USB1_CON USB2 USB3 USBDN2_CON USBDN3_CON
differential pair MCU_CON_USB_D: +MCU_CON_USB_D_P -MCU_CON_USB_D_N
differential pair MCU_USB_D: +MCU_USB_D_P -MCU_USB_D_N
differential pair MX0: +MX0_P -MX0_N
differential pair MX1: +MX1_P -MX1_N
differential pair MX2: +MX2_P -MX2_N
differential pair MX3: +MX3_P -MX3_N
differential pair RS485_RES: +RS485_RES_P -RS485_RES_N
differential pair RS485_SND: +RS485_SND_P -RS485_SND_N
differential pair SATA_CON_RX: +SATA_CON_RX_P -SATA_CON_RX_N
differential pair SATA_CON_TX: +SATA_CON_TX_P -SATA_CON_TX_N
differential pair SSRX0_CON: +SSRX1_CON_P -SSRX1_CON_N
differential pair SSRX0: +SSRX0_P -SSRX0_N
differential pair SSRX1_CON: +SSRX0_CON_P -SSRX0_CON_N
differential pair SSRX1: +SSRX1_P -SSRX1_N
differential pair SSTX0_CON: +SSTX1_CON_P -SSTX1_CON_N
differential pair SSTX0: +SSTX0_P -SSTX0_N
differential pair SSTX1_CON: +SSTX0_CON_P -SSTX0_CON_N
differential pair SSTX1: +SSTX1_P -SSTX1_N
differential pair TRD0: +TRD0_P -TRD0_N
differential pair TRD1: +TRD1_P -TRD1_N
differential pair TRD2: +TRD2_P -TRD2_N
differential pair TRD3: +TRD3_P -TRD3_N
differential pair USB0_CON: +USB1_CON_P -USB1_CON_N
differential pair USB0: +USB0_P -USB0_N
differential pair USB1_CON: +USB0_CON_P -USB0_CON_N
differential pair USB1: +USB1_P -USB1_N
differential pair USB2: +USB2_P -USB2_N
differential pair USB3: +USB3_P -USB3_N
differential pair USBDN2_CON: +USBDN2_CON_P -USBDN2_CON_N
differential pair USBDN3_CON: +USBDN3_CON_P -USBDN3_CON_N
differential pair HDMI_AUX: +HDMI_AUX_P -HDMI_AUX_N
differential pair HDMI_D0: +HDMI_D0_P -HDMI_D0_N
differential pair HDMI_D1: +HDMI_D1_P -HDMI_D1_N
differential pair HDMI_D2: +HDMI_D2_P -HDMI_D2_N
differential pair HDMI_D3: +HDMI_D3_P -HDMI_D3_N
differential pair HDMI_P0: +HDMI_P0_P -HDMI_P0_N
differential pair HDMI_P1: +HDMI_P1_P -HDMI_P1_N
differential pair HDMI_P2: +HDMI_P2_P -HDMI_P2_N
differential pair HDMI_P3: +HDMI_P3_P -HDMI_P3_N
differential pair TMDS_CLK: +TMDS_CLK_P -TMDS_CLK_N
differential pair TMDS_D0: +TMDS_D0_P -TMDS_D0_N
differential pair TMDS_D1: +TMDS_D1_P -TMDS_D1_N
differential pair TMDS_D2: +TMDS_D2_P -TMDS_D2_N

## Components (designator, comment, footprint, x,y, rotation, side; value= is the part's Value field where it differs from the comment)
BT1 "Coin, 20.0mm" BS-7 4796.6,2560 r0 top
C1 "12p" C0402 7422,2322 r180 top
C2 "12p" C0402 7421,2180 r0 top
C3 "18p" C0402 7215,1832 r225 top
C4 "18p" C0402 6983,1614 r45 top
C5 "100nF" C0402 6371.08,2688.92 r315 top
C6 "100nF" C0402 6851.08,1706.08 r225 top
C7 "100nF" C0402 5325,2010 r45 top
C8 "100nF" C0402 3395.31,537.64 r0 top
C9 "100nF" C0402 1045,1347.64 r90 top
C10 "100nF" C0402 1190,1347.95 r90 top
C11 "100nF" C0402 1345,1347.64 r90 top
C12 "100nF" C0402 1495,1342.64 r90 top
C13 "100nF" C0402 2310,2005 r90 top
C14 "1000pF" C1206 830,350 r90 top
C15 "1000pF" C1206 3395,319.41 r90 top
C16 "100nF" C0402 4194,865 r0 top
C17 "100nF" C0402 4195,814 r0 top
C18 "100nF" C0402 3731,1161 r270 top
C19 "100nF" C0402 3783.94,1162.95 r270 top
C20 "100nF" CAP_1608 3688,1443 r90 top value=Value
C21 "100nF" CAP_1608 3744.71,1443 r90 top value=Value
C22 "100nF" CAP_1608 3801.43,1443 r90 top value=Value
C23 "100nF" CAP_1608 3858.14,1443 r90 top value=Value
C24 "100nF" CAP_1608 3914.86,1443 r90 top value=Value
C25 "100nF" CAP_1608 3971.57,1443 r90 top value=Value
C26 "100nF" CAP_1608 4028.29,1443 r90 top value=Value
C27 "100nF" CAP_1608 4085,1443 r90 top value=Value
C28 "10uF" CAP_3216 3505,1130 r90 top value=Value
C29 "100nF" C0402 3670,1065 r270 top
C30 "100nF" C0402 1700,1112.95 r90 top
C31 "100nF" C0402 3050,1810 r90 top
C32 "100nF" C0402 3125.31,1140 r0 bottom
C33 "100nF" C0402 3125.31,1195 r0 bottom
C34 "47uF" CAP_P-B 1995,1382.64 r90 top
C35 "47uF" CAP_P-B 2175,1077.64 r90 top
C36 "100nF" C0402 1630,727.64 r90 top
C37 "100nF" C0402 1675,1397.64 r270 top
C38 "47uF" CAP_P-B 3050,1520 r90 top
C39 "47uF" CAP_P-B 3290,1515 r90 top
C40 "10u" C0603 2359.53,5045 r0 bottom value=10µF
C41 "100nF" C0402 2345.32,4995 r180 bottom
C42 "1uF" CAP_3216 2702,5305 r0 top value=Value
C43 "10uF" CAP_3216 2825,5105 r90 top value=Value
C44 "10uF" CAP_3216 2725,5105 r90 top value=Value
C45 "1uF" CAP_3216 2620,5105 r90 top value=Value
C46 "100nF" C0402 1740,4884.69 r90 bottom
C47 "100nF" C0402 1755,5244.69 r270 bottom
C48 "100uF" C1210C 1095,4975 r0 top
C49 "100uF" C1210C 1095,4845 r0 top
C50 "100uF" C1210C 1095,4715 r0 top
C51 "100uF" C1210C 1096,5160 r0 top
C52 "100uF" C1210C 1095,5290 r0 top
C53 "100uF" C1210C 1094,5420 r0 top
C54 "10n" C0402 2344.68,5100 r0 bottom value=10nF
C55 "100nF" C0402 2345.32,5240 r180 bottom
C56 "22uF" C0805 4115,4895 r270 top
C57 "100nF" C0402 4045,4865.31 r270 top
C58 "100nF" C0402 2525,5769.69 r90 top
C59 "100nF" C0402 2940,5769.69 r90 top
C60 "22uF" C0805 3635,4902.6 r270 top
C61 "100nF" C0402 3565,4885.31 r270 top
C62 "100nF" C0402 895,5519.69 r90 top
C63 "10uF" CAP_3216 1255,5470 r90 top value=Value
C64 "100nF" C0402 4775,5799.69 r270 top
C65 "100nF" C0402 5129.69,5535 r0 top
C66 "100nF" C0402 7345.32,790 r180 top
C67 "1uF" CAP_3216 7912,480 r0 top value=Value
C68 "100nF" C0402 5964,731 r180 top
C69 "100nF" C0402 5964,1188 r0 top
C70 "100nF" C0402 5962,791 r0 top
C71 "100nF" C0402 6080,789 r180 top
C72 "100nF" C0402 6079,726 r0 top
C73 "100nF" C0402 5535,740 r0 top
C74 "100nF" C0402 5539,1186 r180 top
C75 "100nF" C0402 5533,793 r180 top
C76 "100nF" C0402 5637,793 r0 top
C77 "100nF" C0402 5636,736 r180 top
C78 "100nF" C0402 4730,1753 r0 top
C79 "100nF" C0402 4749,2200 r180 top
C80 "100nF" C0402 4730,1804 r0 top
C81 "100nF" C0402 4827,1804 r0 top
C82 "100nF" C0402 4860,1754 r0 top
C83 "100nF" C0402 4095,5755.31 r90 bottom
D1 "LED" D0603_DIRECTIONAL 7477,2006 r315 top
D2 "LED" D0603_DIRECTIONAL 7426.24,1954.76 r315 top
D3 "SML-D12V1WT86" D0603_DIRECTIONAL 772,2260 r90 top
D4 "B560C-13-F" SMC 3519,809 r90 top
D5 "ESD5V3U2U03FH6327XTSA1" PG-TSLP-3-7 3300,600.75 r90 bottom
D6 "ESD5V3U2U03FH6327XTSA1" PG-TSLP-3-7 3113.66,750 r270 top
D7 "ESD5V3U2U03FH6327XTSA1" PG-TSLP-3-7 2744,731 r270 top
D8 "ESD5V3U2U03FH6327XTSA1" PG-TSLP-3-7 2880,730.75 r90 top
D9 "ESD5V3U2U03FH6327XTSA1" PG-TSLP-3-7 2838.66,730.75 r90 bottom
D10 "ESD5V3U2U03FH6327XTSA1" PG-TSLP-3-7 3022,729.25 r270 bottom
D11 "ESD5V3U2U03FH6327XTSA1" PG-TSLP-3-7 2680,749.25 r270 bottom
D12 "BAS4002ARPPE6327HTSA1" SOT143B 1924,751 r0 bottom
D13 "BAS4002ARPPE6327HTSA1" SOT143B 2337.4,692.64 r180 top
D14 "LED" D0603_DIRECTIONAL 2944.06,4780 r180 top
D15 "B560C-13-F" SMC 640,5844.17 r90 top
D16 "SMAJ12A" "SMA / DO-214AC" 850,5905 r90 top
D17 "LED" D0603_DIRECTIONAL 2025,5340 r180 top
D18 "CDSOT23" SOT-23-3 5135,5390 r0 bottom
D19 "BAT43WS" SOD323 7255,995 r315 top
D20 "1N4148" SOD123-L 6622.91,5180 r180 top value=Value
D21 "1N4148" SOD123-L 5990,5200 r180 top value=Value
D22 "TVS" SOT-23-3 4478,5260 r0 top
D23 "TVS" SOT-23-3 3990.6,5520.21 r0 top
D24 "LED" D0603_DIRECTIONAL 6221.76,2698.24 r135 top
D25 "LED" D0603_DIRECTIONAL 6266.76,2743.24 r135 top
D26 "LED" D0603_DIRECTIONAL 5980,2400 r45 top
D27 "LED" D0603_DIRECTIONAL 5948.24,2433.24 r45 top
D28 "LED" D0603_DIRECTIONAL 6175,2655 r135 top
D29 "LED" D0603_DIRECTIONAL 6126.76,2608.24 r135 top
F1 "NANOSMDC075F-2" FUS_NANO_TYCO 5890,3170 r0 top value=Value
F2 "NANOSMDC075F-2" FUS_NANO_TYCO 3670,1270 r0 top value=Value
F3 "C1Q 1" C1 4205,4915 r90 top
F4 "C1Q 1" C1 3725,4921 r90 top
F5 "F1459TR-ND" 0466SERIES 1420,5480 r270 top
FB1 "220R, 2.5A" C0603 3510.47,1255 r0 top
FB2 "742792114" "FERRITE BEAD" 1800,1340 r90 top
FB3 "742792114" "FERRITE BEAD" 1715,808.66 r270 top
FB4 "742792114" "FERRITE BEAD" 1075,5535 r0 top
FID1 "FID_1MMC" FID_40X120D 1735,4510 r0 top
FID2 "FID_1MMC" FID_40X120D 5745,4510 r90 top
FID3 "FID_1MMC" FID_40X120D 1735,1665 r90 top
FID4 "FID_1MMC" FID_40X120D 7095,2170 r90 top
J1 "2X5 Header" "10 PINS" 5717.87,2072.13 r135 top value=Value
J2 "SATA" SATA_RECEPTICLE 955.75,2477.6 r90 top
J3 "HDR 2x5, BOXED" HDR_2X5_2.54MM_BOXED 5530,3730 r0 top
J4 "2-406549-1" RJ45LED 1295.39,317.48 r270 top
J5 "47151-0001" HDMI 3864,357 r270 top
J6 "WM10420-ND" "USB 3 STACK" 3013.43,345 r270 top
J7 "5787617-1" USB-2A 2135.63,402.76 r180 top
J8 "3-6318491-6" "CONN220_3-631849 - WM" 2037,2464 r0 top
J9 "Hdr 4x2mm BOXED" HDR_1X4_2MM_SHDR 3968.78,5120 r90 top
J10 "Hdr 4x2mm BOXED" HDR_1X4_2MM_SHDR 3488.78,5145 r90 top
J11 "PJ-002AH" POWER_JACK_5.5_2.1MM_NS 1122.48,5837.05 r0 top
J12 "HDR 1x2" HDR_1X2_2.54MM 4903,1325 r0 top
J13 "HDR 1x2" HDR_1X2_2.54MM 5048,1223 r180 top
J14 "HDR 1x2" HDR_1X2_2.54MM 5690,1273 r180 top
J15 "HDR 1x2" HDR_1X2_2.54MM 5830,1272 r180 top
J16 "HDR 1x2" HDR_1X2_2.54MM 5104.13,1617.28 r0 top
J17 "HDR 1x2" HDR_1X2_2.54MM 5242,1618 r0 top
J18 "HDR 1x2" HDR_1X2_2.54MM 4903,1008 r180 top
J19 "HDR 1x2" HDR_1X2_2.54MM 4547,1132 r180 top
J20 "HDR 1x2" HDR_1X2_2.54MM 4694,1129 r180 top
J21 "HDR 1x2" HDR_1X2_2.54MM 5050,1111 r0 top
J22 "HDR 1x2" HDR_1X2_2.54MM 4548,994 r0 top
J23 "HDR 1x2" HDR_1X2_2.54MM 5093,1774 r180 top
J24 "HDR 1x2" HDR_1X2_2.54MM 5222,1771 r180 top
J25 "HDR 1x2" HDR_1X2_2.54MM 4697,996 r0 top
J26 "HEADER" TERMINALBLOCK3P508 4910,6030 r0 top value=Value
J27 "USB Type B" "USB-B RECEPTACLE" 7522.01,441.06 r270 top
J28 "DSUB-9 Stacked" DSUB9-DOUBLE 6510,556.81 r180 top
J29 "HDR 1x3" HDR_1X3_2.54MM 7000,5020 r0 top
J30 "HDR 1x3" HDR_1X3_2.54MM 8055,4915 r0 top
J31 "DSUB-9 Stacked" DSUB9-DOUBLE 5204,556.81 r180 top
J32 "HDR 1x2" HDR_1X2_2.54MM 6800,4985 r0 top
J33 "HDR 1x3" HDR_1X3_2.54MM 7950,4915 r0 top
J34 "HDR 1x3" HDR_1X3_2.54MM 7180,4550 r90 top
K1 "EC2-5NU" EC2NU 6520,5821 r180 top value=Value
K2 "EC2-5NU" EC2NU 5880,5826 r180 top value=Value
L1 "ACM2012-900-2P-T002" ACM2012 2954.25,920 r270 bottom
L2 "ACM2012-900-2P-T002" ACM2012 2859.25,920 r270 top
L3 "ACM2012-900-2P-T002" ACM2012 2655,920 r270 top
L4 "ACM2012-900-2P-T002" ACM2012 2750,920 r270 bottom
L5 "ACM2012-900-2P-T002" ACM2012 3050.75,920 r270 top
L6 "ACM2012-900-2P-T002" ACM2012 3135,920 r270 bottom
L7 "ACM2012-900-2P-T002" ACM2012 2210,752.64 r270 bottom
L8 "ACM2012-900-2P-T002" ACM2012 2125,752.64 r270 bottom
L9 "4.7µH" IHLP_255MILX270MIL 1385,4855 r0 top
L10 "4.7µH" IHLP_255MILX270MIL 1385,5235 r180 top
L11 "ACM2012-900-2P-T002" ACM2012 7145,435 r0 top
LS1 "GT-0903A" GT-0903A 3758,4507 r0 top
LS2 "GT-0903A" GT-0903A 7241.52,2620 r0 top
MH1 "MH_12MMC_10MMD" MH_12MMC_10MMD 703.74,5215.55 r0 top locked
MH2 "MH_12MMC_10MMD" MH_12MMC_10MMD 703.74,936.02 r0 top locked
MH3 "MH_12MMC_10MMD" MH_12MMC_10MMD 7727.36,5215.55 r0 top locked
MH4 "MH_12MMC_10MMD" MH_12MMC_10MMD 7727.36,936.02 r0 top locked
MH5 "MH_7MMC_3.2MMD" MH_7MMC_3.2MMD 632.87,4488.19 r0 top locked
MH6 "MH_7MMC_3.2MMD" MH_7MMC_3.2MMD 632.87,1663.39 r0 top locked
MH7 "MH_7MMC_3.2MMD" MH_7MMC_3.2MMD 7798.23,1663.39 r0 top locked
MH8 "MH_7MMC_3.2MMD" MH_7MMC_3.2MMD 7798.23,4488.19 r0 top locked
P2 "76384-303LF" HDR_1X3_2.54MM_SHDR_V2 5593,4231 r0 top
P3 "76384-303LF" HDR_1X3_2.54MM_SHDR_V2 5814,4231 r0 top
P4 "76384-303LF" HDR_1X3_2.54MM_SHDR_V2 6136,4092 r90 top
P5 "0532540770" WM3412-ND 4535.04,4574.37 r90 top
P6 "76384-303LF" HDR_1X3_2.54MM_SHDR_V2 6549,1319 r0 top
P7 "76384-303LF" HDR_1X3_2.54MM_SHDR_V2 6330.6,1321 r0 top
P8 "0395321012" WM7852-ND 5733.64,6035 r90 top
P9 "Plug" 691313710005 4501.85,6030 r180 top
Q1 "MOSFET N-CH 20V 1A SOT323" SC70_SOT323 3413,4555 r180 top
Q2 "2N7002BKW,115" SC70_SOT323 4199.41,1528.9 r90 top
Q3 "2N7002BKW,115" SC70_SOT323 4205,1396.5 r90 top
Q4 "SI4816BDY-T1-GE3" 8_SOIC_3.9MM 1770,4865 r180 top
Q5 "SI4816BDY-T1-GE3" 8_SOIC_3.9MM 1775.24,5260 r180 top
Q6 "2N7002BKW,115" SC70_SOT323 2685,4805 r90 top
Q7 "MOSFET N-CH 20V 1A SOT323" SC70_SOT323 7155,2385 r0 top
Q8 "MMBT2222AWT3G" SC70_SOT323 6392.4,5344.41 r0 top
Q9 "MMBT2222AWT3G" SC70_SOT323 5540,5484 r0 top
R1 "240R" R0402 7423,2063 r135 top
R2 "240R" R0402 7365,2011 r135 top
R3 "0R" R0402 5905,1555 r45 top
R4 "47k5" R0402 5722,2208 r45 top
R5 "47k5" R0402 5662,1781 r225 top
R6 "75R" R0402 1045,1262.95 r90 top
R7 "75R" R0402 1190,1262.32 r90 top
R8 "75R" R0402 1345,1262.64 r90 top
R9 "75R" R0402 1495,1262.64 r90 top
R10 "240R" R0402 855,2315 r270 top
R11 "33R" R0402 3532.69,4626 r0 top
R12 "100R" R0402 3526,4479 r90 top
R13 "1K" R0402 5443,4231 r180 top
R14 "1K" R0402 5447,4031 r180 top
R15 "470R" R0402 4704,2867 r90 top
R16 "2K2" R0402 3770,961 r270 top
R17 "2K2" R0402 3706,960 r270 top
R18 "0R" R0402 4253,1106 r90 top
R19 "2K2" R0402 4239,961 r0 top
R20 "2K2" R0402 4239,1016 r0 top
R21 "100K" STA_RNCP0805-M 3754,693 r90 top
R22 "4K7" RES0805_CRG_TYCO 4311,1531 r90 top
R23 "4K7" RES0805_CRG_TYCO 4310,1396.5 r90 top value=4k7
R24 "100K" STA_RNCP0805-M 3960,2600 r180 top
R25 "0R" R0402 2260,4760 r0 bottom
R26 "1R" R0402 1759.68,4820 r0 bottom
R27 "1R" R0402 1775,5180 r180 bottom
R28 "0R" R0402 2455,4875.31 r270 bottom
R29 "0R" R0402 2400,4875.31 r270 bottom
R30 "200K" R0402 2175,5369.69 r90 bottom
R31 "200K" R0402 2155,4870.31 r90 bottom
R32 "200K" R0402 2060,4870.31 r270 bottom
R33 "0R" R0402 2105,4870.31 r270 bottom
R34 "0R" R0402 2344.69,5190 r180 bottom
R35 "0R" R0402 2345,5145 r180 bottom
R36 "33R" R0402 2775,5769.69 r90 top
R37 "0R" R0402 2640,5769.69 r270 top
R38 "10K" R0402 3165,5769.69 r90 top
R39 "33R" R0402 3050,5769.69 r270 top
R40 "240R" R0402 2865.32,4840 r180 top
R41 "1k" R0402 2065,5425 r90 top
R42 "0R" R0402 4830,5799.69 r270 top
R43 "10R" R0402 4720,5799.69 r270 top
R44 "120R" RES_R1632 5161,4972 r180 top
R45 "1K" R0402 6146,3936 r270 top
R46 "1K" R0402 6358,3942 r270 top
R47 "47k5" R0402 7099.69,2465 r0 top
R48 "4k99" R0402 7500.32,4950 r180 top
R49 "0R" R0402 6389.69,5720 r180 top
R50 "0R" R0402 5755.31,5715 r180 top
R51 "0R" R0402 6389.69,5515 r180 top
R52 "100R" R0402 6430,5199.69 r270 top
R53 "0R" R0402 5755,5520 r180 top
R54 "100R" R0402 5819.69,5200 r0 top
R55 "365R" R0402 7300,4660 r0 top
R56 "1K" R0402 6275,5350 r90 top
R57 "1K" R0402 5641,5357 r180 top
R58 "1K" R0402 7130,5769.69 r90 bottom
R59 "1K" R0402 7950.31,5740 r0 top
R60 "120R" RES_R1632 4112,5384 r0 top
R61 "1K" R0402 7580,5760 r270 top
R62 "1K" R0402 7135,5235 r90 bottom
R63 "10R" R0402 4440,5765 r90 top
R64 "10R" R0402 4370,5765 r90 top
R65 "240R" R0402 6285,2615 r315 top
R66 "240R" R0402 6325,2655 r315 top
R67 "240R" R0402 6071.08,2398.92 r315 top
R68 "240R" R0402 6036.08,2363.92 r315 top
R69 "240R" R0402 6245,2575 r315 top
R70 "240R" R0402 6205,2535 r315 top
R71 "1K" R0402 7335,5765 r90 top
R72 "1K" R0402 7949.68,5740 r0 bottom
R73 "1K" R0402 7335,5235 r90 top
R74 "10R" R0402 4040,5764.69 r90 top
R75 "1K" R0402 7580,5760.31 r270 bottom
R76 "10R" R0402 3975,5765 r90 top
S1 "TL3305AF160QG" TACTILESW_SMD 5612.6,1852.4 r135 top
S2 "FSMRA3JH" FSMRA3JH 2645,6035 r180 top
S3 "FSMRA2JH" FSMRA2JH 3060,6035 r180 top
S4 "R1966ABLKBLKGR" ROCKERSWITCH 1915,5605 r0 top
T1 "H5007NL" H5007NL 1320,1267.64 r270 bottom
TP1 "TP_25MILC" TP_25C 3018.03,5040 r90 top
TP2 "TP_25MILC" TP_25C 1153.03,4540 r90 top
TP3 "TP_25MILC" TP_25C 2380,5380 r90 top
TP4 "TP_25MILC" TP_25C 1595,5421.97 r0 top
U1 "PIC24EP512GU810-I/PF-ND" TQFP100_14X14MC 6590,2160 r315 top value=Value
U2 "BAT54S" SOT-23 5255,3210 r90 top value=Value
U3 "BAT54S" SOT-23 5191.34,3862 r180 top value=Value
U4 "BAT54S" SOT-23 5905,3735 r90 top value=Value
U5 "BAT54S" SOT-23 5905,3570 r90 top value=Value
U6 "BAT54S" SOT-23 5898,3395 r90 top value=Value
U7 "BAT54S" SOT-23 4852,3193.66 r90 top value=Value
U8 "BAT54S" SOT-23 5070,3205 r90 top value=Value
U9 "SN74LVC1G17DCKR" DCK5 990,2270 r180 top value=Value
U10 "SN74LVC244APWR" PW20 5060,3575 r0 top value=Value
U11 "296-35765-6-ND" DQA10 3910,713 r90 top value=Value
U12 "296-35765-6-ND" DQA10 4054.69,713.86 r270 top value=Value
U13 "BAT54S" SOT-23 4815,2887 r90 top value=Value
U14 "MAX9406ETM+" 21-0144H_T4877-6 4000,1045 r0 top
U15 "MIC2026-1YM TR" 8_SOIC_3.9MM 1885,1057.64 r0 top
U16 "TPS2066DR" D8 3285,1160 r270 bottom value=Value
U17 "ISL6236AIRZ" 32_VFQFN_EXPOSED_PAD 2125,5110 r180 bottom
U18 "296-26335-1-ND" D8 5130,5725 r90 top value=Value
U19 "TVS DIODE 5V 8.1V SOT23-6" 21-0058I 7280,670 r0 top value=Value
U20 "ST3222" TSSOP20 5942.05,866.13 r0 top
U21 "CRE1S0505SC" CRE1S0505SC 6560,4690 r0 top
U22 "ST3222" TSSOP20 5513.64,865 r0 top
U23 "ST3222BTR" TSSOP20 4727.82,1866 r0 top
U24 "LTV-817S-TA1" 4-SMD-OPTO 7315.67,4885 r0 top
U25 "LTV-817S-TA1" 4-SMD-OPTO 7580.67,5665 r0 top
U26 "LTV-817S-TA1" 4-SMD-OPTO 7130,5325.67 r90 bottom
U27 "MAX490ECSA+" 21-0041B_8 4195,5615 r0 bottom
U28 "LTV-817S-TA1" 4-SMD-OPTO 7335,5325 r90 top
U29 "LTV-817S-TA1" 4-SMD-OPTO 7935,5665 r180 bottom
Y1 "32.768kHz" XTAL-1.1MM 7400,2252 r90 top
Y2 "XTAL-8MHz" HC49/US 7170,1646 r45 top

## Footprints (in the part's own frame and the unit in brackets; to place one, negate y for a bottom-side part, rotate by r counter-clockwise, add the part's x,y. Pads: shape width x height; smd on the part's side, far side on the other; paste and mask are expansions set on the pad)
4-SMD-OPTO [mm]
  rect 1.5x1.3 smd: 1(0,0) 2(0,-2.54) 3(9,-2.54) 4(9,0)
  silkscreen extent -0.07,-3.38 7.98,1.2, body extent -0.63,-3.35 9.57,0.75, height 2.09
8_SOIC_3.9MM [mm]
  rect 1.2x0.58 smd: 1(-2.8,1.905) 2(-2.8,0.635) 3(-2.8,-0.635) 4(-2.8,-1.905) 5(2.8,-1.905) 6(2.8,-0.635) 7(2.8,0.635) 8(2.8,1.905)
  silkscreen extent -1.91,-2.54 1.91,2.54, body extent -3,-2.45 3,2.45, height 1.75
"10 PINS" [mil]
  round 60 hole 40 paste+0 mask+0: 1(-400,-100) 2(-400,0) 3(-300,-100) 4(-300,0) 5(-200,-100) 6(-200,0) 7(-100,-100) 8(-100,0) 9(0,-100) 10(0,0)
  silkscreen extent -495,-150 55,50, body extent -450,-150 50,50, height 330
21-0041B_8 [mil]
  rect 78x21 smd paste+0 mask+0: 1(-97,75) 2(-97,25) 3(-97,-25) 4(-97,-75) 5(97,-75) 6(97,-25) 7(97,25) 8(97,75)
  silkscreen extent -145,-104 84,120, body extent -122,-99 122,99, height 69
21-0058I [mil]
  rect 52x22 smd paste+0 mask+0: 1(-47,37.4) 2(-47,0) 3(-47,-37.4) 4(47,-37.4) 5(47,0) 6(47,37.4)
  silkscreen extent -68,-64 40,64, body extent -59,-59 59,59, height 57
21-0144H_T4877-6 [mil]
  rect 50x12 smd paste+0 mask+0: 1(-145,108.27) 2(-145,88.58) 3(-145,68.9) 4(-145,49.21) 5(-145,29.53) 6(-145,9.84) 7(-145,-9.84) 8(-145,-29.53) 9(-145,-49.21) 10(-145,-68.9) 11(-145,-88.58) 12(-145,-108.27) 25(145,-108.27) 26(145,-88.58) 27(145,-68.9) 28(145,-49.21) 29(145,-29.53) 30(145,-9.84) 31(145,9.84) 32(145,29.53) 33(145,49.21) 34(145,68.9) 35(145,88.58) 36(145,108.27)
  rect 12x50 smd paste+0 mask+0: 13(-108.27,-145) 14(-88.58,-145) 15(-68.9,-145) 16(-49.21,-145) 17(-29.53,-145) 18(-9.84,-145) 19(9.84,-145) 20(29.53,-145) 21(49.21,-145) 22(68.9,-145) 23(88.58,-145) 24(108.27,-145) 37(108.27,145) 38(88.58,145) 39(68.9,145) 40(49.21,145) 41(29.53,145) 42(9.84,145) 43(-9.84,145) 44(-29.53,145) 45(-49.21,145) 46(-68.9,145) 47(-88.58,145) 48(-108.27,145)
  rect 220x220 smd paste-109.5 mask+0: 49(0,0)
  silkscreen extent -174,-172 172,172, body extent -140,-140 140,140, height 32
32_VFQFN_EXPOSED_PAD [mm]
  rect 1.016x0.23 smd mask+0.051: 1(-2.603,1.75) 2(-2.603,1.25) 3(-2.603,0.75) 4(-2.603,0.25) 5(-2.603,-0.25) 6(-2.603,-0.75) 7(-2.603,-1.25) 8(-2.603,-1.75) 17(2.603,-1.75) 18(2.603,-1.25) 19(2.603,-0.75) 20(2.603,-0.25) 21(2.603,0.25) 22(2.603,0.75) 23(2.603,1.25) 24(2.603,1.75)
  rect 0.23x1.016 smd mask+0.051: 9(-1.75,-2.603) 10(-1.25,-2.603) 11(-0.75,-2.603) 12(-0.25,-2.603) 13(0.25,-2.603) 14(0.75,-2.603) 15(1.25,-2.603) 16(1.75,-2.603) 25(1.75,2.603) 26(1.25,2.603) 27(0.75,2.603) 28(0.25,2.603) 29(-0.25,2.603) 30(-0.75,2.603) 31(-1.25,2.603) 32(-1.75,2.603)
  rect 3.3x3.3 smd paste-10 mask+0.051: 33(0,0)
  silkscreen extent -2.85,-2.54 2.54,2.93, body extent -2.54,-2.54 2.54,2.54, height 0.9
0466SERIES [mil]
  rect 45x65 smd paste+0 mask+1: 1(-60.5,0) 2(60.5,0)
  silkscreen extent -105,-38 26,40, body extent -67,-35 67,35, height 31
691313710005 [mm]
  round 2.5 hole 1.6: 1(0,0) 2(5,0) 3(10,0) 4(15,0)
  oval 2.5x2.6 hole 1.6: 5(20,0)
  silkscreen extent -3.5,-10 23.5,2, body extent -3.44,-10.06 23.56,1.94, height 8.57
ACM2012 [mm]
  rect 0.902x0.4 smd mask+0.076: 1(-1.001,0.4) 2(-1.001,-0.4) 3(1.001,-0.4) 4(1.001,0.4)
  silkscreen extent -1.1,-0.9 1.1,0.9, body extent -1.17,-0.73 1.23,0.67, height 1.3
BS-7 [mm]
  round 2 hole 1.6: 1(0,0) 2(20,0)
  silkscreen extent -0.69,-11.16 23.46,11.11, body extent -1.05,-11.05 23.45,10.95, height 8.5
C1 [mil]
  rect 50x70 smd paste+0 mask+0: 1(-56,0) 2(56,0)
  silkscreen extent -117,-40 19,40, body extent -67,-35 67,35, height 31
C0402 [mm]
  rect 0.5x0.5 smd: 1(-0.5,0) 2(0.5,0)
  silkscreen extent -1,-0.5 1,0.5, body extent -0.5,-0.25 0.5,0.25, height 0.56
C0603 [mm]
  rect 0.8x0.8 smd: 1(-0.75,0) 2(0.75,0)
  silkscreen extent -1.4,-0.7 1.4,0.7, body extent -0.8,-0.42 0.8,0.44, height 0.95
C0805 [mm]
  rect 0.9x1.3 smd: 1(-0.95,0) 2(0.95,0)
  silkscreen extent -1.78,-1.02 1.78,1.02, body extent -1,-0.6 1,0.6, height 1.5
C1206 [mm]
  rect 2.3x1.8 smd: 1(-1.95,0) 2(1.95,0)
  silkscreen extent -0.4,-0.8 0.4,0.8, body extent -1.7,-0.89 2,1.06, height 1.85
C1210C [mil]
  rect 44x107 smd paste+0 mask+0: 1(-59,0) 2(59,0)
  silkscreen extent -25,-58 25,58, body extent -67,-54 67,54, height 91
CAP_1608 [mil]
  rect 16x35 smd paste+0 mask+0: 1(-33.5,0) 2(33.5,0)
  silkscreen extent -77,-22 13,22, body extent -34,-17 34,17, height 35
CAP_3216 [mil]
  rect 16x71 smd paste+0 mask+0: 1(-67,0) 2(67,0)
  silkscreen extent -111,-40 47,40, body extent -67,-36 67,36, height 49
CAP_P-B [mil]
  rect 101x72 smd paste+0 mask+0: 1(-99.5,0) 2(99.5,0)
  silkscreen extent -183,-114 114,114, body extent -122,-108 122,109, height 234
"CONN220_3-631849 - WM" [mil] "COMe with module mounted on."
  rect 100x100 smd: 0(-157,-104)
  rect 40x100 smd: 2(2300,-104)
  round 69 / inner round 60 / far side round 69 hole 69: 221(-63.17,-104.33) 222(2208.83,-104.33)
  rect 13x100 smd paste+0 mask+0: A1(0,-228.66) A2(19.69,-228.66) A3(39.37,-228.66) A4(59.06,-228.66) A5(78.74,-228.66) A6(98.43,-228.66) A7(118.11,-228.66) A8(137.8,-228.66) A9(157.48,-228.66) A10(177.17,-228.66) A11(196.85,-228.66) A12(216.54,-228.66) A13(236.22,-228.66) A14(255.91,-228.66) A15(275.59,-228.66) A16(295.28,-228.66) A17(314.96,-228.66) A18(334.65,-228.66) A19(354.33,-228.66) A20(374.02,-228.66) A21(393.7,-228.66) A22(413.39,-228.66) A23(433.07,-228.66) A24(452.76,-228.66) A25(472.44,-228.66) A26(492.13,-228.66) A27(511.81,-228.66) A28(531.5,-228.66) A29(551.18,-228.66) A30(570.87,-228.66) A31(590.55,-228.66) A32(610.24,-228.66) A33(629.92,-228.66) A34(649.61,-228.66) A35(669.29,-228.66) A36(688.98,-228.66) A37(708.66,-228.66) A38(728.35,-228.66) A39(748.03,-228.66) A40(767.72,-228.66) A41(787.4,-228.66) A42(807.09,-228.66) A43(826.77,-228.66) A44(846.46,-228.66) A45(866.14,-228.66) A46(885.83,-228.66) A47(905.51,-228.66) A48(925.2,-228.66) A49(944.88,-228.66) A50(964.57,-228.66) A51(984.25,-228.66) A52(1003.94,-228.66) A53(1023.62,-228.66) A54(1043.31,-228.66) A55(1062.99,-228.66) A56(1082.68,-228.66) A57(1102.36,-228.66) A58(1122.05,-228.66) A59(1141.73,-228.66) A60(1161.42,-228.66) A61(1181.1,-228.66) A62(1200.79,-228.66) A63(1220.47,-228.66) A64(1240.16,-228.66) A65(1259.84,-228.66) A66(1279.53,-228.66) A67(1299.21,-228.66) A68(1318.9,-228.66) A69(1338.58,-228.66) A70(1358.27,-228.66) A71(1377.95,-228.66) A72(1397.64,-228.66) A73(1417.32,-228.66) A74(1437.01,-228.66) A75(1456.69,-228.66) A76(1476.38,-228.66) A77(1496.06,-228.66) A78(1515.75,-228.66) A79(1535.43,-228.66) A80(1555.12,-228.66) A81(1574.8,-228.66) A82(1594.49,-228.66) A83(1614.17,-228.66) A84(1633.86,-228.66) A85(1653.54,-228.66) A86(1673.23,-228.66) A87(1692.91,-228.66) A88(1712.6,-228.66) A89(1732.28,-228.66) A90(1751.97,-228.66) A91(1771.65,-228.66) A92(1791.34,-228.66) A93(1811.02,-228.66) A94(1830.71,-228.66) A95(1850.39,-228.66) A96(1870.08,-228.66) A97(1889.76,-228.66) A98(1909.45,-228.66) A99(1929.13,-228.66) A100(1948.82,-228.66) A101(1968.5,-228.66) A102(1988.19,-228.66) A103(2007.87,-228.66) A104(2027.56,-228.66) A105(2047.24,-228.66) A106(2066.93,-228.66) A107(2086.61,-228.66) A108(2106.3,-228.66) A109(2125.98,-228.66) A110(2145.67,-228.66) B1(0,20) B2(19.69,20) B3(39.37,20) B4(59.06,20) B5(78.74,20) B6(98.43,20) B7(118.11,20) B8(137.8,20) B9(157.48,20) B10(177.17,20) B11(196.85,20) B12(216.54,20) B13(236.22,20) B14(255.91,20) B15(275.59,20) B16(295.28,20) B17(314.96,20) B18(334.65,20) B19(354.33,20) B20(374.02,20) B21(393.7,20) B22(413.39,20) B23(433.07,20) B24(452.76,20) B25(472.44,20) B26(492.13,20) B27(511.81,20) B28(531.5,20) B29(551.18,20) B30(570.87,20) B31(590.55,20) B32(610.24,20) B33(629.92,20) B34(649.61,20) B35(669.29,20) B36(688.98,20) B37(708.66,20) B38(728.35,20) B39(748.03,20) B40(767.72,20) B41(787.4,20) B42(807.09,20) B43(826.77,20) B44(846.46,20) B45(866.14,20) B46(885.83,20) B47(905.51,20) B48(925.2,20) B49(944.88,20) B50(964.57,20) B51(984.25,20) B52(1003.94,20) B53(1023.62,20) B54(1043.31,20) B55(1062.99,20) B56(1082.68,20) B57(1102.36,20) B58(1122.05,20) B59(1141.73,20) B60(1161.42,20) B61(1181.1,20) B62(1200.79,20) B63(1220.47,20) B64(1240.16,20) B65(1259.84,20) B66(1279.53,20) B67(1299.21,20) B68(1318.9,20) B69(1338.58,20) B70(1358.27,20) B71(1377.95,20) B72(1397.64,20) B73(1417.32,20) B74(1437.01,20) B75(1456.69,20) B76(1476.38,20) B77(1496.06,20) B78(1515.75,20) B79(1535.43,20) B80(1555.12,20) B81(1574.8,20) B82(1594.49,20) B83(1614.17,20) B84(1633.86,20) B85(1653.54,20) B86(1673.23,20) B87(1692.91,20) B88(1712.6,20) B89(1732.28,20) B90(1751.97,20) B91(1771.65,20) B92(1791.34,20) B93(1811.02,20) B94(1830.71,20) B95(1850.39,20) B96(1870.08,20) B97(1889.76,20) B98(1909.45,20) B99(1929.13,20) B100(1948.82,20) B101(1968.5,20) B102(1988.19,20) B103(2007.87,20) B104(2027.56,20) B105(2047.24,20) B106(2066.93,20) B107(2086.61,20) B108(2106.3,20) B109(2125.98,20) B110(2145.67,20)
  silkscreen extent -720,-345 2604,1819, body extent -712,-345 2602,1820, height 589
CRE1S0505SC [mm]
  rect 2.5x1.2 hole 0.3 square: 1(0,0)
  oval 2.5x1.2 hole 0.3 square: 2(0,2.54) 3(0,5.08) 4(0,7.62)
  silkscreen extent -5.21,-2.16 1.78,9.78, body extent -4.95,-2.21 1.17,9.32, height 10.19
D8 [mil]
  rect 78x22 smd paste+0 mask+0: 1(-97,75) 2(-97,25) 3(-97,-25) 4(-97,-75) 5(97,-75) 6(97,-25) 7(97,25) 8(97,75)
  silkscreen extent -123,-104 84,112, body extent -122,-99 122,99, height 69
D0603_DIRECTIONAL [mm] "0603 Case Diode"
  rect 0.8x0.8 smd: 1(0,0) 2(1.5,0)
  silkscreen extent -0.56,-0.74 2.34,0.71, body extent -0.09,-0.37 1.52,0.43, height 0.75
DCK5 [mil]
  rect 46x14 smd paste+0 mask+0: 1(-38,25.59) 2(-38,0) 3(-38,-25.59) 4(38,-25.59) 5(38,25.59)
  silkscreen extent -54,-48 33,49, body extent -55,-45 55,50, height 57
DQA10 [mm]
  rect 0.702x0.3 smd paste-0.15 mask+0: 1(-0.486,1) 2(-0.486,0.5) 4(-0.486,-0.5) 5(-0.486,-1) 6(0.486,-1) 7(0.486,-0.5) 9(0.486,0.5) 10(0.486,1)
  rect 0.702x0.4 smd paste+0 mask+0: 3(-0.486,0) 8(0.486,0)
  silkscreen extent -0.93,-1.68 0.93,1.68, body extent -0.55,-1.3 0.55,1.3, height 0.55
DSUB9-DOUBLE [mm] "Double Stacked D-Sub Connector 2x9"
  round 2 hole 1.1: 1(-0.01,-0.005) 2(2.765,-0.005) 3(5.54,-0.005) 4(8.315,-0.005) 5(11.09,0) 6(1.377,2.84) 7(4.152,2.84) 8(6.927,2.84) 9(9.702,2.84) 10(0,6.65) 11(2.772,6.65) 12(5.545,6.65) 13(8.317,6.65) 14(11.09,6.65) 15(1.377,9.49) 16(4.152,9.49) 17(6.927,9.49) 18(9.702,9.49)
  round 4 hole 3.2: 19(-6.82,1.65) 20(18.05,1.61) 21(-6.855,9.56) 22(18.02,9.61)
  silkscreen extent -10.18,-1.7 21.56,26.17, body extent -9.82,-1.59 21,23.81, height 32.57
EC2NU [mil]
  round 50 / inner round 60 / far side round 50 hole 30 paste+0 mask+0: 1(-200,501) 3(-200,301) 4(-200,201) 5(-200,101) 8(0,101) 9(0,201) 10(0,301) 12(0,501)
  silkscreen extent -282,-50 53,551, body extent -247,-45 47,546, height 370
"FERRITE BEAD" [mm]
  rect 1.1x1.2 smd: 1(-1.55,0) 2(1.55,0)
  silkscreen extent -2.41,-0.89 2.41,0.89, body extent -1.6,-0.8 1.6,0.8, height 1.08
FID_40X120D [mil]
  round 40 smd paste-40 mask+40: 1(0,0)
FSMRA2JH [mm]
  round 1.8 hole 1: 1(-2.25,-1.245) 2(2.25,-1.245)
  round 2.2 hole 1.3: 3(-3.505,1.245) 4(3.505,1.245)
  silkscreen extent -3.65,-5.14 3.65,2.85, body extent -4.2,-5.09 4.2,2.77, height 7.05
FSMRA3JH [mm]
  round 1.8 hole 1: 1(-2.25,-1.245) 2(2.25,-1.245)
  round 2.2 hole 1.3: 3(-3.505,1.245) 4(3.505,1.245)
  silkscreen extent -3.65,-7.14 3.65,2.85, body extent -4.2,-7.1 4.2,2.74, height 7.05
FUS_NANO_TYCO [mil]
  rect 44x71 smd paste+0 mask+0: 1(-59,0) 2(59,0)
  silkscreen extent -25,-40 25,40, body extent -67,-36 67,36, height 39
GT-0903A [mm]
  round 1.2 hole 0.6: 1(0,0) 2(4,0)
  silkscreen extent -2.5,-4.5 6.5,4.5, body extent -2.52,-4.53 6.48,4.47, height 4.21
H5007NL [mil]
  rect 75x30 smd: 1(-287.5,275) 2(-287.5,225) 3(-287.5,175) 4(-287.5,125) 5(-287.5,75) 6(-287.5,25) 7(-287.5,-25) 8(-287.5,-75) 9(-287.5,-125) 10(-287.5,-175) 11(-287.5,-225) 12(-287.5,-275) 13(287.5,-275) 14(287.5,-225) 15(287.5,-175) 16(287.5,-125) 17(287.5,-75) 18(287.5,-25) 19(287.5,25) 20(287.5,75) 21(287.5,125) 22(287.5,175) 23(287.5,225) 24(287.5,275)
  silkscreen extent -240,-346 240,346, body extent -240,-346 240,346, height 217
HC49/US [mm]
  rect 5.6x2.1 smd: 1(-4.75,0) 2(4.75,0)
  body extent -5.8,-2.45 5.8,2.45, height 4.2
HDMI [mm]
  rect 3.048x0.3 smd mask+0.025: 1(-3.556,4.5) 2(-3.556,4) 3(-3.556,3.5) 4(-3.556,3) 5(-3.556,2.5) 6(-3.556,2) 7(-3.556,1.5) 8(-3.556,1) 9(-3.556,0.5) 10(-3.556,0) 11(-3.556,-0.5) 12(-3.556,-1) 13(-3.556,-1.5) 14(-3.556,-2) 15(-3.556,-2.5) 16(-3.556,-3) 17(-3.556,-3.5) 18(-3.556,-4) 19(-3.556,-4.5)
  oval 4x3.3 hole 3: MTG1(-2.6,7.25) MTG3(-2.6,-7.25)
  round 3 hole 2: MTG2(3.36,7.25) MTG4(3.36,-7.25)
  silkscreen extent -5.1,-10 12.05,10, body extent -4.2,-7.5 7.95,7.5, height 6.28
HDR_1X2_2.54MM [mm]
  rect 2x1.6 hole 1.1: 1(0,0)
  oval 2x1.6 hole 1.1: 2(0,-2.54)
  silkscreen extent -1.3,-3.81 1.3,1.27, body extent -1.2,-3.62 1.2,1.06, height 8.4
HDR_1X3_2.54MM [mm]
  rect 2x1.6 hole 1.1: 1(0,0)
  oval 2x1.6 hole 1.1: 2(0,-2.54) 3(0,-5.08)
  silkscreen extent -1.3,-6.36 1.3,1.27, body extent -1.2,-6.15 1.21,1.07, height 8.4
HDR_1X3_2.54MM_SHDR_V2 [mm]
  rect 2x1.6 hole 1.1: 1(0,0)
  oval 2x1.6 hole 1.1: 2(0,-2.54) 3(0,-5.08)
  silkscreen extent -2.3,-6.35 2.7,1.27, body extent -2.64,-5.8 2.61,0.82, height 8.84
HDR_1X4_2MM_SHDR [mm]
  rect 1.4x1.4 hole 0.8: 1(0,0)
  round 1.4 hole 0.8: 2(0,-2) 3(0,-4) 4(0,-6)
  silkscreen extent -2.25,-8.1 1.6,2.1, body extent -2.15,-8 1.5,2, height 5.55
HDR_2X5_2.54MM_BOXED [mm]
  rect 1.7x1.7 hole 1: 1(0,0)
  round 1.7 hole 1: 2(2.54,0) 3(0,-2.54) 4(2.54,-2.54) 5(0,-5.08) 6(2.54,-5.08) 7(0,-7.62) 8(2.54,-7.62) 9(0,-10.16) 10(2.54,-10.16)
  silkscreen extent -2.9,-15.19 5.89,5.03, body extent -2.91,-15.22 5.91,5.08, height 8.89
IHLP_255MILX270MIL [mil]
  rect 90x135 smd: 1(-118,0) 2(118,0)
  silkscreen extent -148,-148 148,148, body extent -135,-130 135,130, height 118
MH_7MMC_3.2MMD [mil]
MH_12MMC_10MMD [mil] "Mounting hole"
PG-TSLP-3-7 [mm]
  rect 0.4x0.45 smd: 1(0,1.05) 2(-0.4,0) 3(0.4,0)
  silkscreen extent -0.76,-0.38 0.76,1.4, body extent -0.62,0.03 0.64,1.08, height 0.45
POWER_JACK_5.5_2.1MM_NS [mm]
  round 5 hole 3.2: 1(2.35,-3.25)
  round 5 hole 2.7: 2(2.35,3.25)
  oval 4x5 hole 2.7: 3(-2.35,-0.25)
  silkscreen extent -2.4,-3.9 6.85,16.6, body extent -2.55,-3.9 6.85,10.5, height 11
PW20 [mil]
  rect 66x14 smd paste+0 mask+0: 1(-111,115.16) 2(-111,89.57) 3(-111,63.98) 4(-111,38.39) 5(-111,12.8) 6(-111,-12.8) 7(-111,-38.39) 8(-111,-63.98) 9(-111,-89.57) 10(-111,-115.16) 11(111,-115.16) 12(111,-89.57) 13(111,-63.98) 14(111,-38.39) 15(111,-12.8) 16(111,12.8) 17(111,38.39) 18(111,63.98) 19(111,89.57) 20(111,115.16)
  silkscreen extent -164,-135 164,135, body extent -130,-130 130,130, height 47
R0402 [mm]
  rect 0.5x0.6 smd: 1(-0.5,0) 2(0.5,0)
  silkscreen extent -1,-0.6 1,0.6, body extent -0.5,-0.25 0.5,0.25, height 0.4
RES0805_CRG_TYCO [mil]
  rect 32x55 smd paste+0 mask+0: 1(-34.5,0) 2(34.5,0)
  silkscreen extent -6,-32 6,32, body extent -43,-27 43,27, height 26
RES_R1632 [mil]
  rect 41.56x132 smd paste+0 mask+0: 1(-27.72,0) 2(27.72,0)
  body extent -34,-66 34,66, height 26
RJ45LED [mm]
  round 1.3 hole 0.9: 1(2.03,3.55) 2(0.25,2.53) 3(2.03,1.52) 4(0.25,0.5) 5(2.03,-0.51) 6(0.25,-1.52) 7(2.03,-2.54) 8(0.25,-3.56)
  round 1.575 hole 0.9: 9(-4.57,6.86) 10(-4.57,4.57) 11(-4.57,-4.57) 12(-4.57,-6.86)
  round 2.7 hole 1.6: 13(1.14,8.13) 14(1.14,-8.13)
  round 3.25 hole 3.25 unplated: 15(4.57,6.35) 16(4.57,-6.35)
  silkscreen extent -5.91,-8.3 16.6,8.3, body extent -5.9,-9.3 10.82,9.33, height 14.8
ROCKERSWITCH [mm]
  round 2.5 hole 1.85: 1(0,0)
  round 2.5 hole 2: 2(7,0)
  silkscreen extent -10.77,-2.06 10.67,22.43, body extent -10.52,-0.76 10.42,22.13, height 13.24
SATA_RECEPTICLE [mm] "22 Pin Sata Connector"
  rect 0.65x1.9 smd: 1(35.87,-2.14) 2(34.6,-2.14) 3(33.33,-2.14) 4(32.06,-2.14) 5(30.79,-2.14) 6(29.52,-2.14) 7(28.25,-2.14) 8(21.905,-2.14) 9(20.635,-2.14) 10(19.365,-2.14) 11(18.095,-2.14) 12(16.825,-2.14) 13(15.555,-2.14) 14(14.285,-2.14) 15(13.015,-2.14) 16(11.745,-2.14) 17(10.475,-2.14) 18(9.205,-2.14) 19(7.935,-2.14) 20(6.665,-2.14) 21(5.395,-2.14) 22(4.125,-2.14)
  rrect50% 1.524x3.81 hole 0.762 slot 3.048 at 90 deg: 23(1.27,0.229) 23(38.684,0.279)
  round 2 hole 1.651: 23(3.404,1.016) 23(36.576,1.016)
  body extent -0.23,-2.59 40.2,10.28, height 4.69
SC70_SOT323 [mm]
  rect 0.9x0.7 smd: 1(-0.95,0.65) 2(-0.95,-0.65) 3(0.95,0)
  silkscreen extent -0.7,-1.27 0.7,1.27, body extent -1.27,-1.27 1.27,1.27, height 1.1
"SMA / DO-214AC" [mm]
  rect 3x1.55 smd: 1(-1.9,0) 2(1.9,0)
  silkscreen extent -2.3,-1.4 2.85,1.4, body extent -2.69,-1.42 2.59,1.37, height 2.34
SMC [mm]
  rect 2.5x3.3 smd: 1(-3.45,0) 2(3.45,0)
  silkscreen extent -4.6,-3.2 4.65,3.2, body extent -3.98,-2.95 3.97,2.95, height 2.3
SOD123-L [mm]
  rect 0.806x0.55 smd paste+0 mask+0: 1(-1.674,0) 2(1.674,0)
  silkscreen extent -1.98,-0.8 1.55,0.8, body extent -1.92,-0.67 1.93,0.68, height 0.81
SOD323 [mm]
  rect 1.111x0.401 smd paste+0 mask+0: 1(-1.15,0) 2(1.15,0)
  silkscreen extent -1.03,-0.83 1.03,0.83, body extent -1.35,-0.7 1.35,0.7, height 0.81
SOT143B [mil]
  rect 37x46 smd paste+0 mask+0: 1(-29.4,-40)
  rect 21x46 smd paste+0 mask+0: 2(37.4,-40) 3(37.4,40) 4(-37.4,40)
  silkscreen extent -114,-54 59,28, body extent -59,-49 59,49, height 43
SOT-23 [mil]
  rect 22x40 smd paste+0 mask+0: 1(-41.34,-48) 2(41.34,-48) 3(0,48)
  silkscreen extent -71,-61 65,37, body extent -58,-49 58,49, height 40
SOT-23-3 [mm] "SOT-23; 3 Leads; Body 3.0 x 2.6 mm, inc. leads (LxW max)"
  rect 0.9x0.95 smd: 1(-0.95,-1.25) 2(0.95,-1.25) 3(0,1.25)
  silkscreen extent -1.39,-0.51 -1.14,-0.26, body extent -1.49,-1.2 1.43,1.1, height 1.03
STA_RNCP0805-M [mil]
  rect 44x59 smd paste+0 mask+0: 1(-32.5,0) 2(32.5,0)
  silkscreen extent -90,-3 -85,3, body extent -43,-27 43,27, height 24
TACTILESW_SMD [mm]
  rect 1.6x1.4 smd: 1(0,0) 1(6.2,0) 2(0,3) 2(6.2,3)
  body extent -0.65,-0.75 6.85,3.75, height 3.7
TERMINALBLOCK3P508 [mm] "3 Pin, 5.08 mm pitch Terminal Block"
  round 4 hole 1.778: 1(0,0) 2(5.08,0) 3(10.16,0)
  silkscreen extent -3.17,-4.19 13.87,10.08, body extent -3.17,-1.94 13.83,10.06, height 8.31
TP_25C [mil]
  round 120 hole 50 paste-25 mask+2: 1(0,-1.97)
TQFP100_14X14MC [mil]
  rect 58x11 smd paste+0 mask+0: 1(-300,236.22) 2(-300,216.54) 3(-300,196.85) 4(-300,177.17) 5(-300,157.48) 6(-300,137.8) 7(-300,118.11) 8(-300,98.43) 9(-300,78.74) 10(-300,59.06) 11(-300,39.37) 12(-300,19.69) 13(-300,0) 14(-300,-19.69) 15(-300,-39.37) 16(-300,-59.06) 17(-300,-78.74) 18(-300,-98.43) 19(-300,-118.11) 20(-300,-137.8) 21(-300,-157.48) 22(-300,-177.17) 23(-300,-196.85) 24(-300,-216.54) 25(-300,-236.22) 51(300,-236.22) 52(300,-216.54) 53(300,-196.85) 54(300,-177.17) 55(300,-157.48) 56(300,-137.8) 57(300,-118.11) 58(300,-98.43) 59(300,-78.74) 60(300,-59.06) 61(300,-39.37) 62(300,-19.69) 63(300,0) 64(300,19.69) 65(300,39.37) 66(300,59.06) 67(300,78.74) 68(300,98.43) 69(300,118.11) 70(300,137.8) 71(300,157.48) 72(300,177.17) 73(300,196.85) 74(300,216.54) 75(300,236.22)
  rect 11x58 smd paste+0 mask+0: 26(-236.22,-300) 27(-216.54,-300) 28(-196.85,-300) 29(-177.17,-300) 30(-157.48,-300) 31(-137.8,-300) 32(-118.11,-300) 33(-98.43,-300) 34(-78.74,-300) 35(-59.06,-300) 36(-39.37,-300) 37(-19.69,-300) 38(0,-300) 39(19.69,-300) 40(39.37,-300) 41(59.06,-300) 42(78.74,-300) 43(98.43,-300) 44(118.11,-300) 45(137.8,-300) 46(157.48,-300) 47(177.17,-300) 48(196.85,-300) 49(216.54,-300) 50(236.22,-300) 76(236.22,300) 77(216.54,300) 78(196.85,300) 79(177.17,300) 80(157.48,300) 81(137.8,300) 82(118.11,300) 83(98.43,300) 84(78.74,300) 85(59.06,300) 86(39.37,300) 87(19.69,300) 88(0,300) 89(-19.69,300) 90(-39.37,300) 91(-59.06,300) 92(-78.74,300) 93(-98.43,300) 94(-118.11,300) 95(-137.8,300) 96(-157.48,300) 97(-177.17,300) 98(-196.85,300) 99(-216.54,300) 100(-236.22,300)
  silkscreen extent -364,-349 349,349, body extent -315,-315 315,315, height 47
TSSOP20 [mm] "SO20 - 20 Leads; Body Width 7.5 mm; Pitch 1.27 mm"
  rect 0.4x1.6 smd: 1(0,0) 2(0.65,0) 3(1.3,0) 4(1.95,0) 5(2.6,0) 6(3.25,0) 7(3.9,0) 8(4.55,0) 9(5.2,0) 10(5.85,0) 11(5.85,6.55) 12(5.2,6.55) 13(4.55,6.55) 14(3.9,6.55) 15(3.25,6.55) 16(2.6,6.55) 17(1.95,6.55) 18(1.3,6.55) 19(0.65,6.55) 20(0,6.55)
  silkscreen extent -0.87,-0.12 6.67,5.07, body extent -0.39,0 6.2,6.5, height 1.4
"USB 3 STACK" [mm]
  round 0.9 hole 0.7: 1(0,0) 2(0,-2.5) 3(0,-4.5) 4(0,-7) 5(-1.5,-7.5) 6(-1.5,-5.5) 7(-1.5,-3.5) 8(-1.5,-1.5) 9(-1.5,0.5) 10(-3.2,0) 11(-3.2,-2.5) 12(-3.2,-4.5) 13(-3.2,-7) 14(-4.7,-7.5) 15(-4.7,-5.5) 16(-4.7,-3.5) 17(-4.7,-1.5) 18(-4.7,0.5)
  rrect50% 3x3 / inner round 2.3 / far side rrect50% 3x3 hole 2.3: 19(2,3.07)
  rrect50% 3x3 hole 2.3: 21(2,-10.197) 22(-3.68,-10.07) 23(-3.68,3.07)
  silkscreen extent -6.07,-11.95 11.58,4.82, body extent -5.94,-11.38 11.52,4.29, height 16.2
USB-2A [mm]
  round 1.524 hole 1: 1(3.5,0.13) 2(1,0.13) 3(-1,0.13) 4(-3.5,0.13) 5(3.5,-2.49) 6(1,-2.49) 7(-1,-2.49) 8(-3.5,-2.49)
  round 3 hole 2.4: 9(-6.57,2.84) 10(6.57,2.84) 11(-6.57,-2.84) 12(6.57,-2.84)
  silkscreen extent -10.75,-4.5 10.75,18.4, body extent -8.1,-4.1 8.14,13.08, height 15.78
"USB-B RECEPTACLE" [mm]
  rect 1.6x1.6 hole 1: 1(-1,1.25)
  round 1.6 hole 1: 2(-1,-1.25) 3(1,-1.25) 4(1,1.25)
  round 3.8 hole 2.4: 5(3.71,6.02) 6(3.71,-6.02)
  silkscreen extent -2.42,-6.02 14.1,6.02, body extent -2.44,-7.45 14.06,7.45, height 11.02
WM3412-ND [mm]
  rect 4x1.27 smd: 1(-1,0) 2(-1,-2) 3(-1,-4) 4(-1,-6) 5(-1,-8) 6(-1,-10) 7(-1,-12)
  silkscreen extent -1.4,-14.2 6.27,2.11, body extent -1.39,-14.1 5.91,1.9, height 4.13
WM7852-ND [mil]
  rect 90x90 hole 60: 1(0,0)
  round 90 hole 60: 2(0,-199.27) 3(0,-398.55) 4(0,-597.82) 5(0,-797.09) 6(0,-996.36) 7(0,-1195.64) 8(0,-1394.91) 9(0,-1594.18) 10(0,-1793.45) 11(0,-2192) 12(0,-1992.73)
  silkscreen extent -218,-2344 399,148, body extent -81,-2334 389,146, height 330
XTAL-1.1MM [mm] "TH Crystal"
  round 0.75 hole 0.5 mask+0.1: 1(-0.55,0) 2(0.55,0)
  body extent -1.62,-1.61 1.58,1.59, height 8.3